# Altium PCB Control_Board.PcbDoc (part 1 of 4)
Units mm, origin at the board's own origin, x right, y up, seen from the top; angles counter-clockwise.
Board outline 90.17 x 96 mm, 6 copper layers (Top Layer, GND, POWER, Signal, PGND, Bottom Layer), stack 1.346 mm thick; 251 components, 196 nets, 963 pads, 633 vias.
Unrouted connection lines stored in the file: 3.
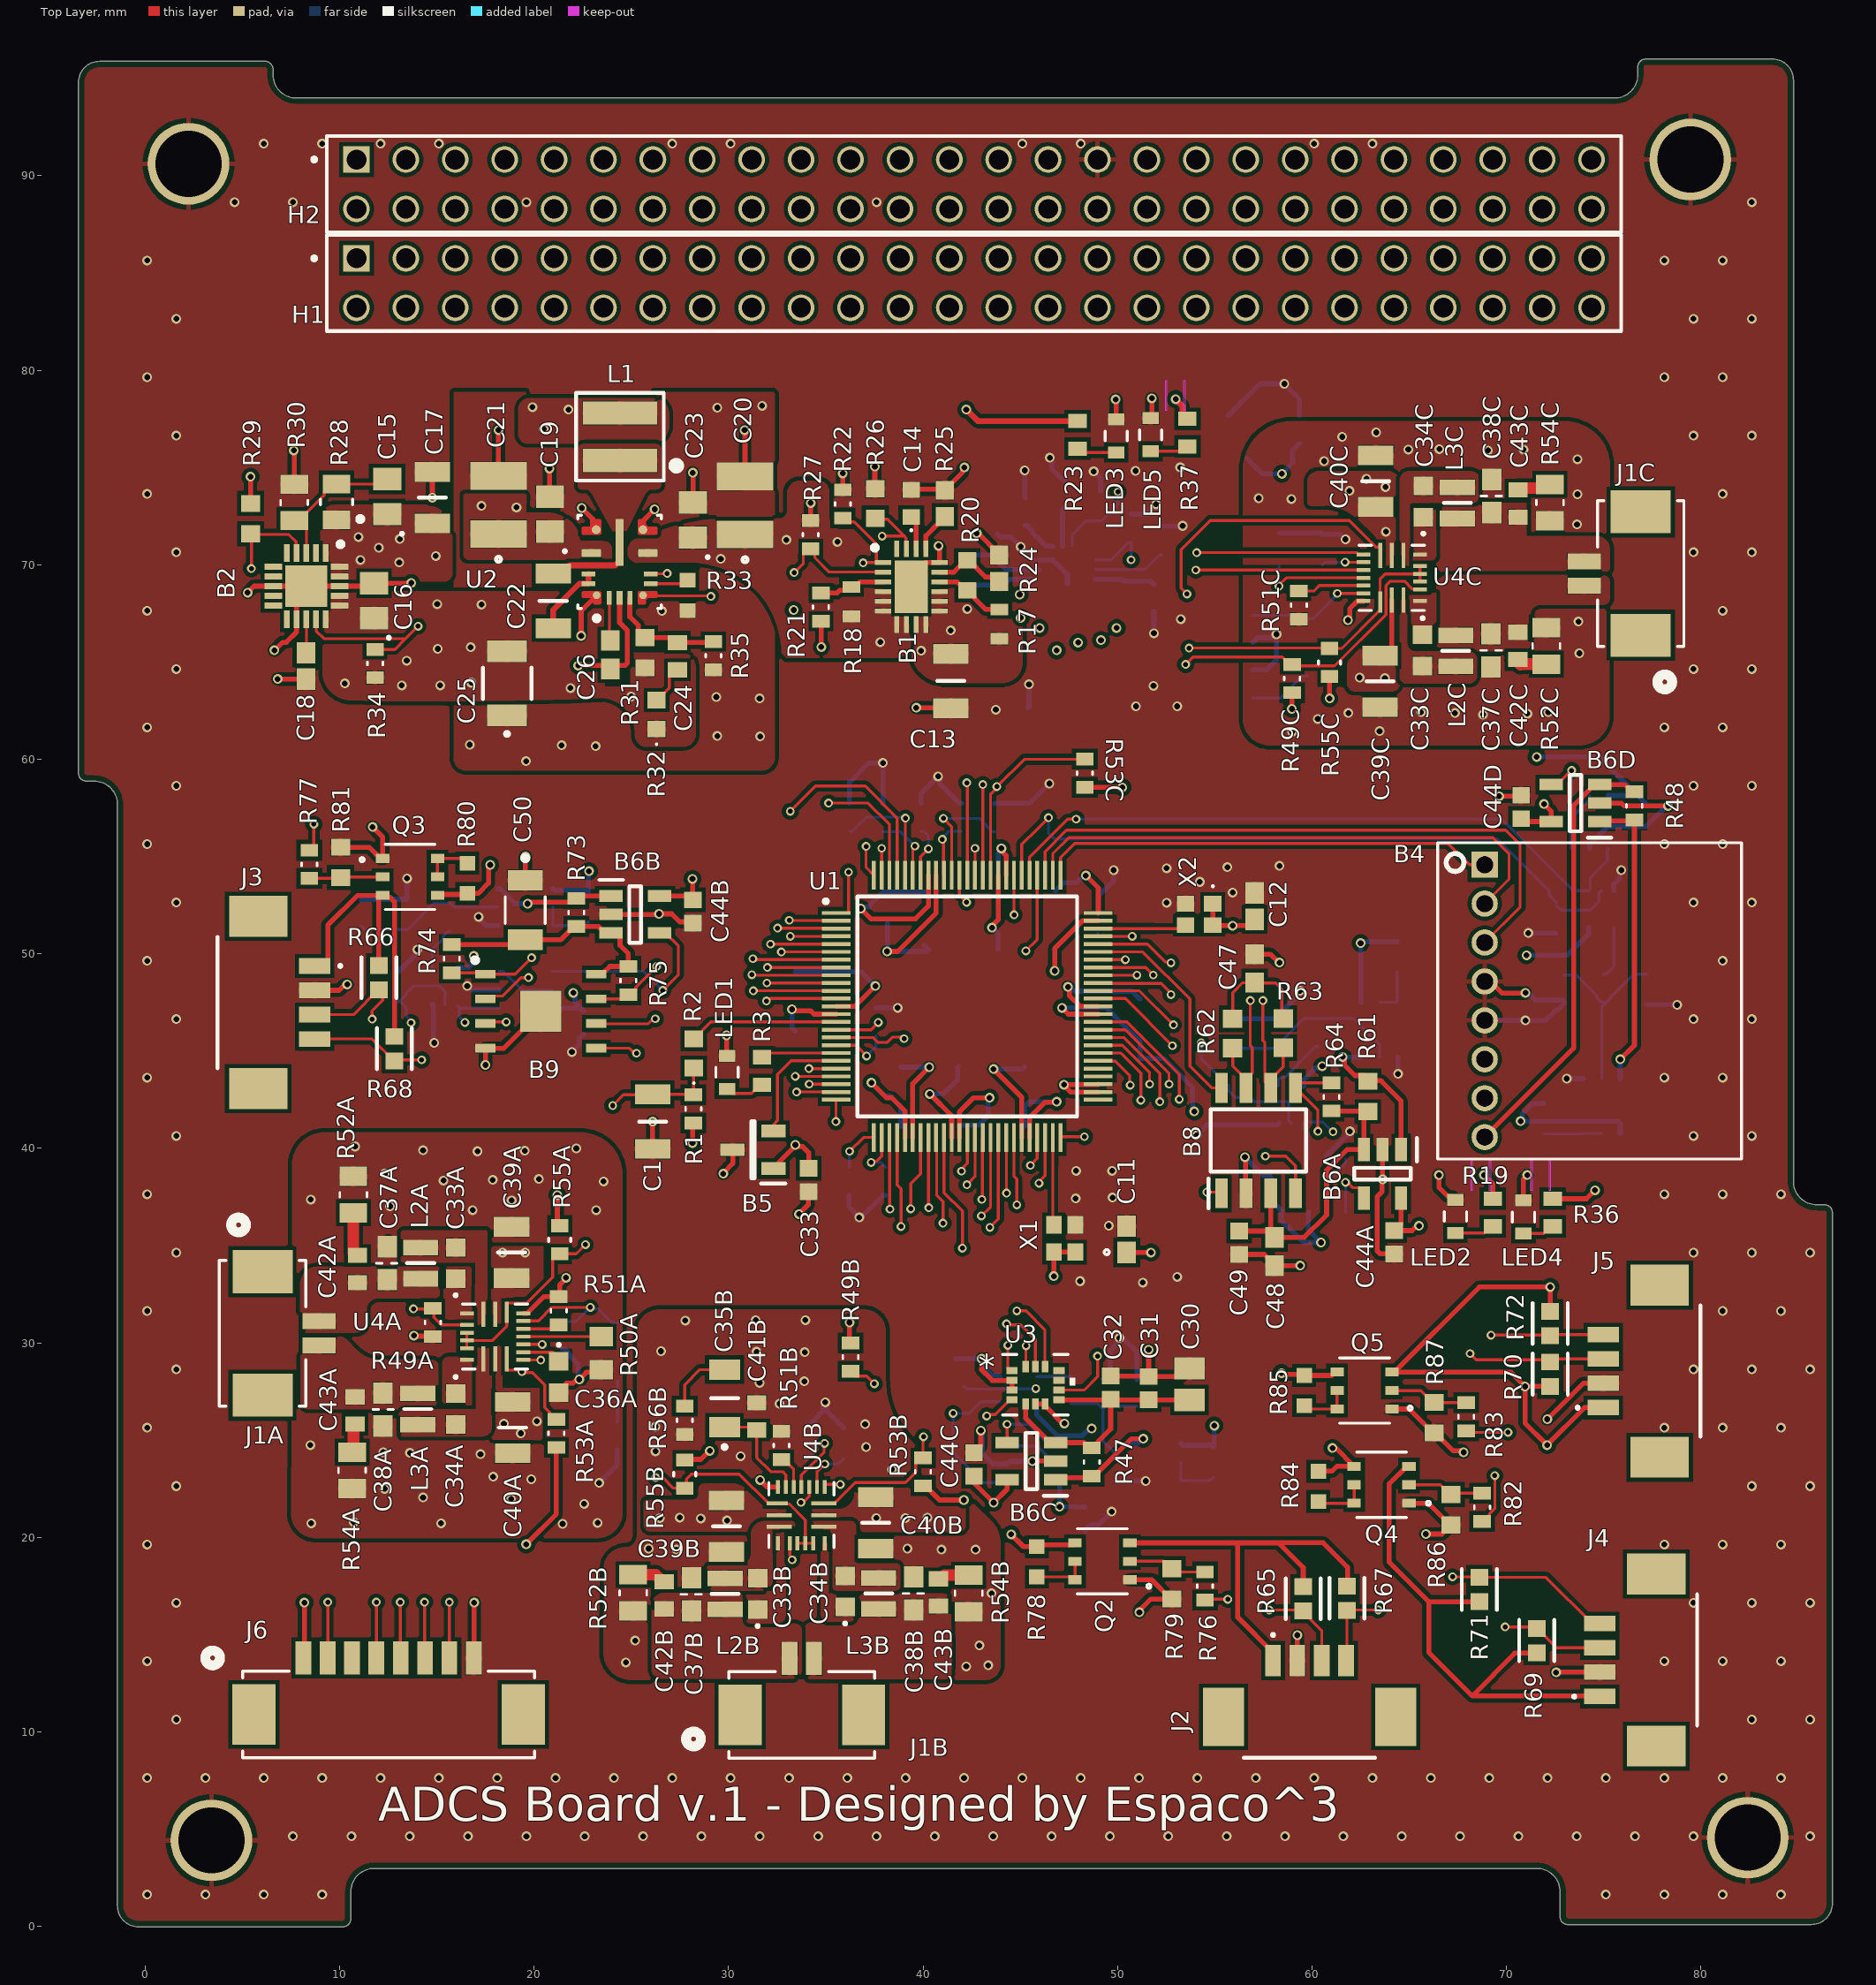
[diagram p0: Top Layer view]
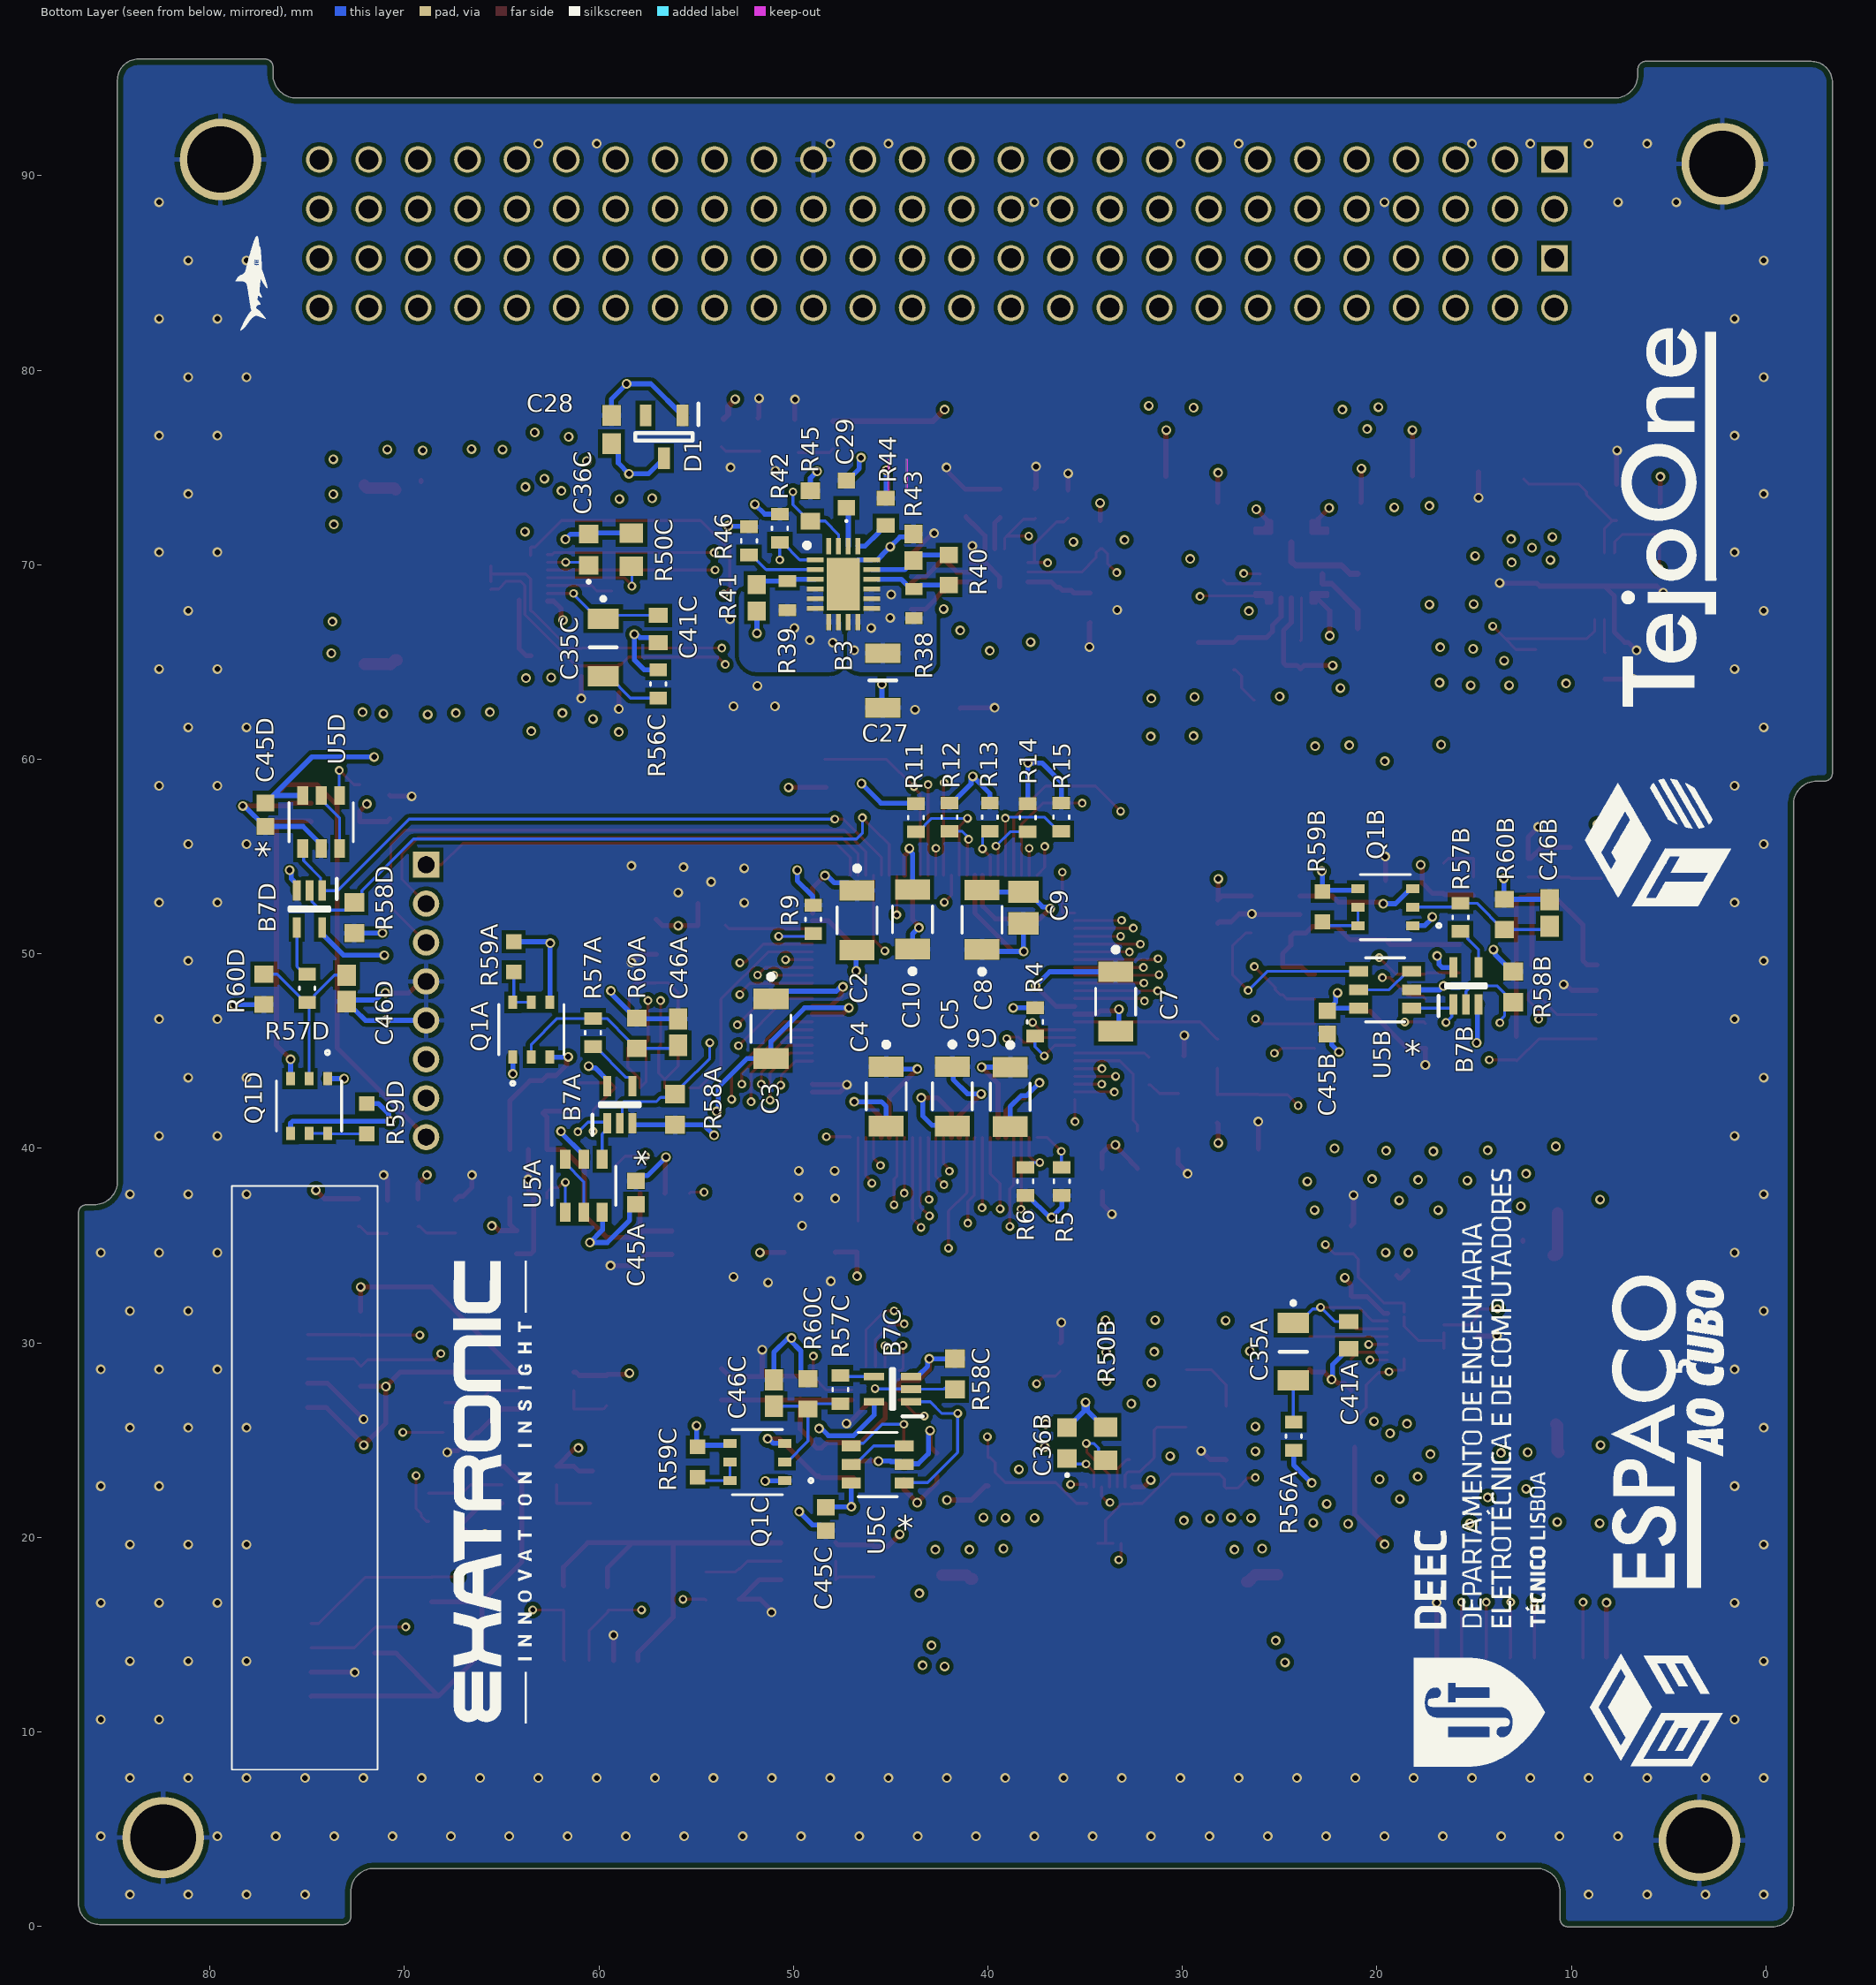
[diagram p1: Bottom Layer view, seen from below]
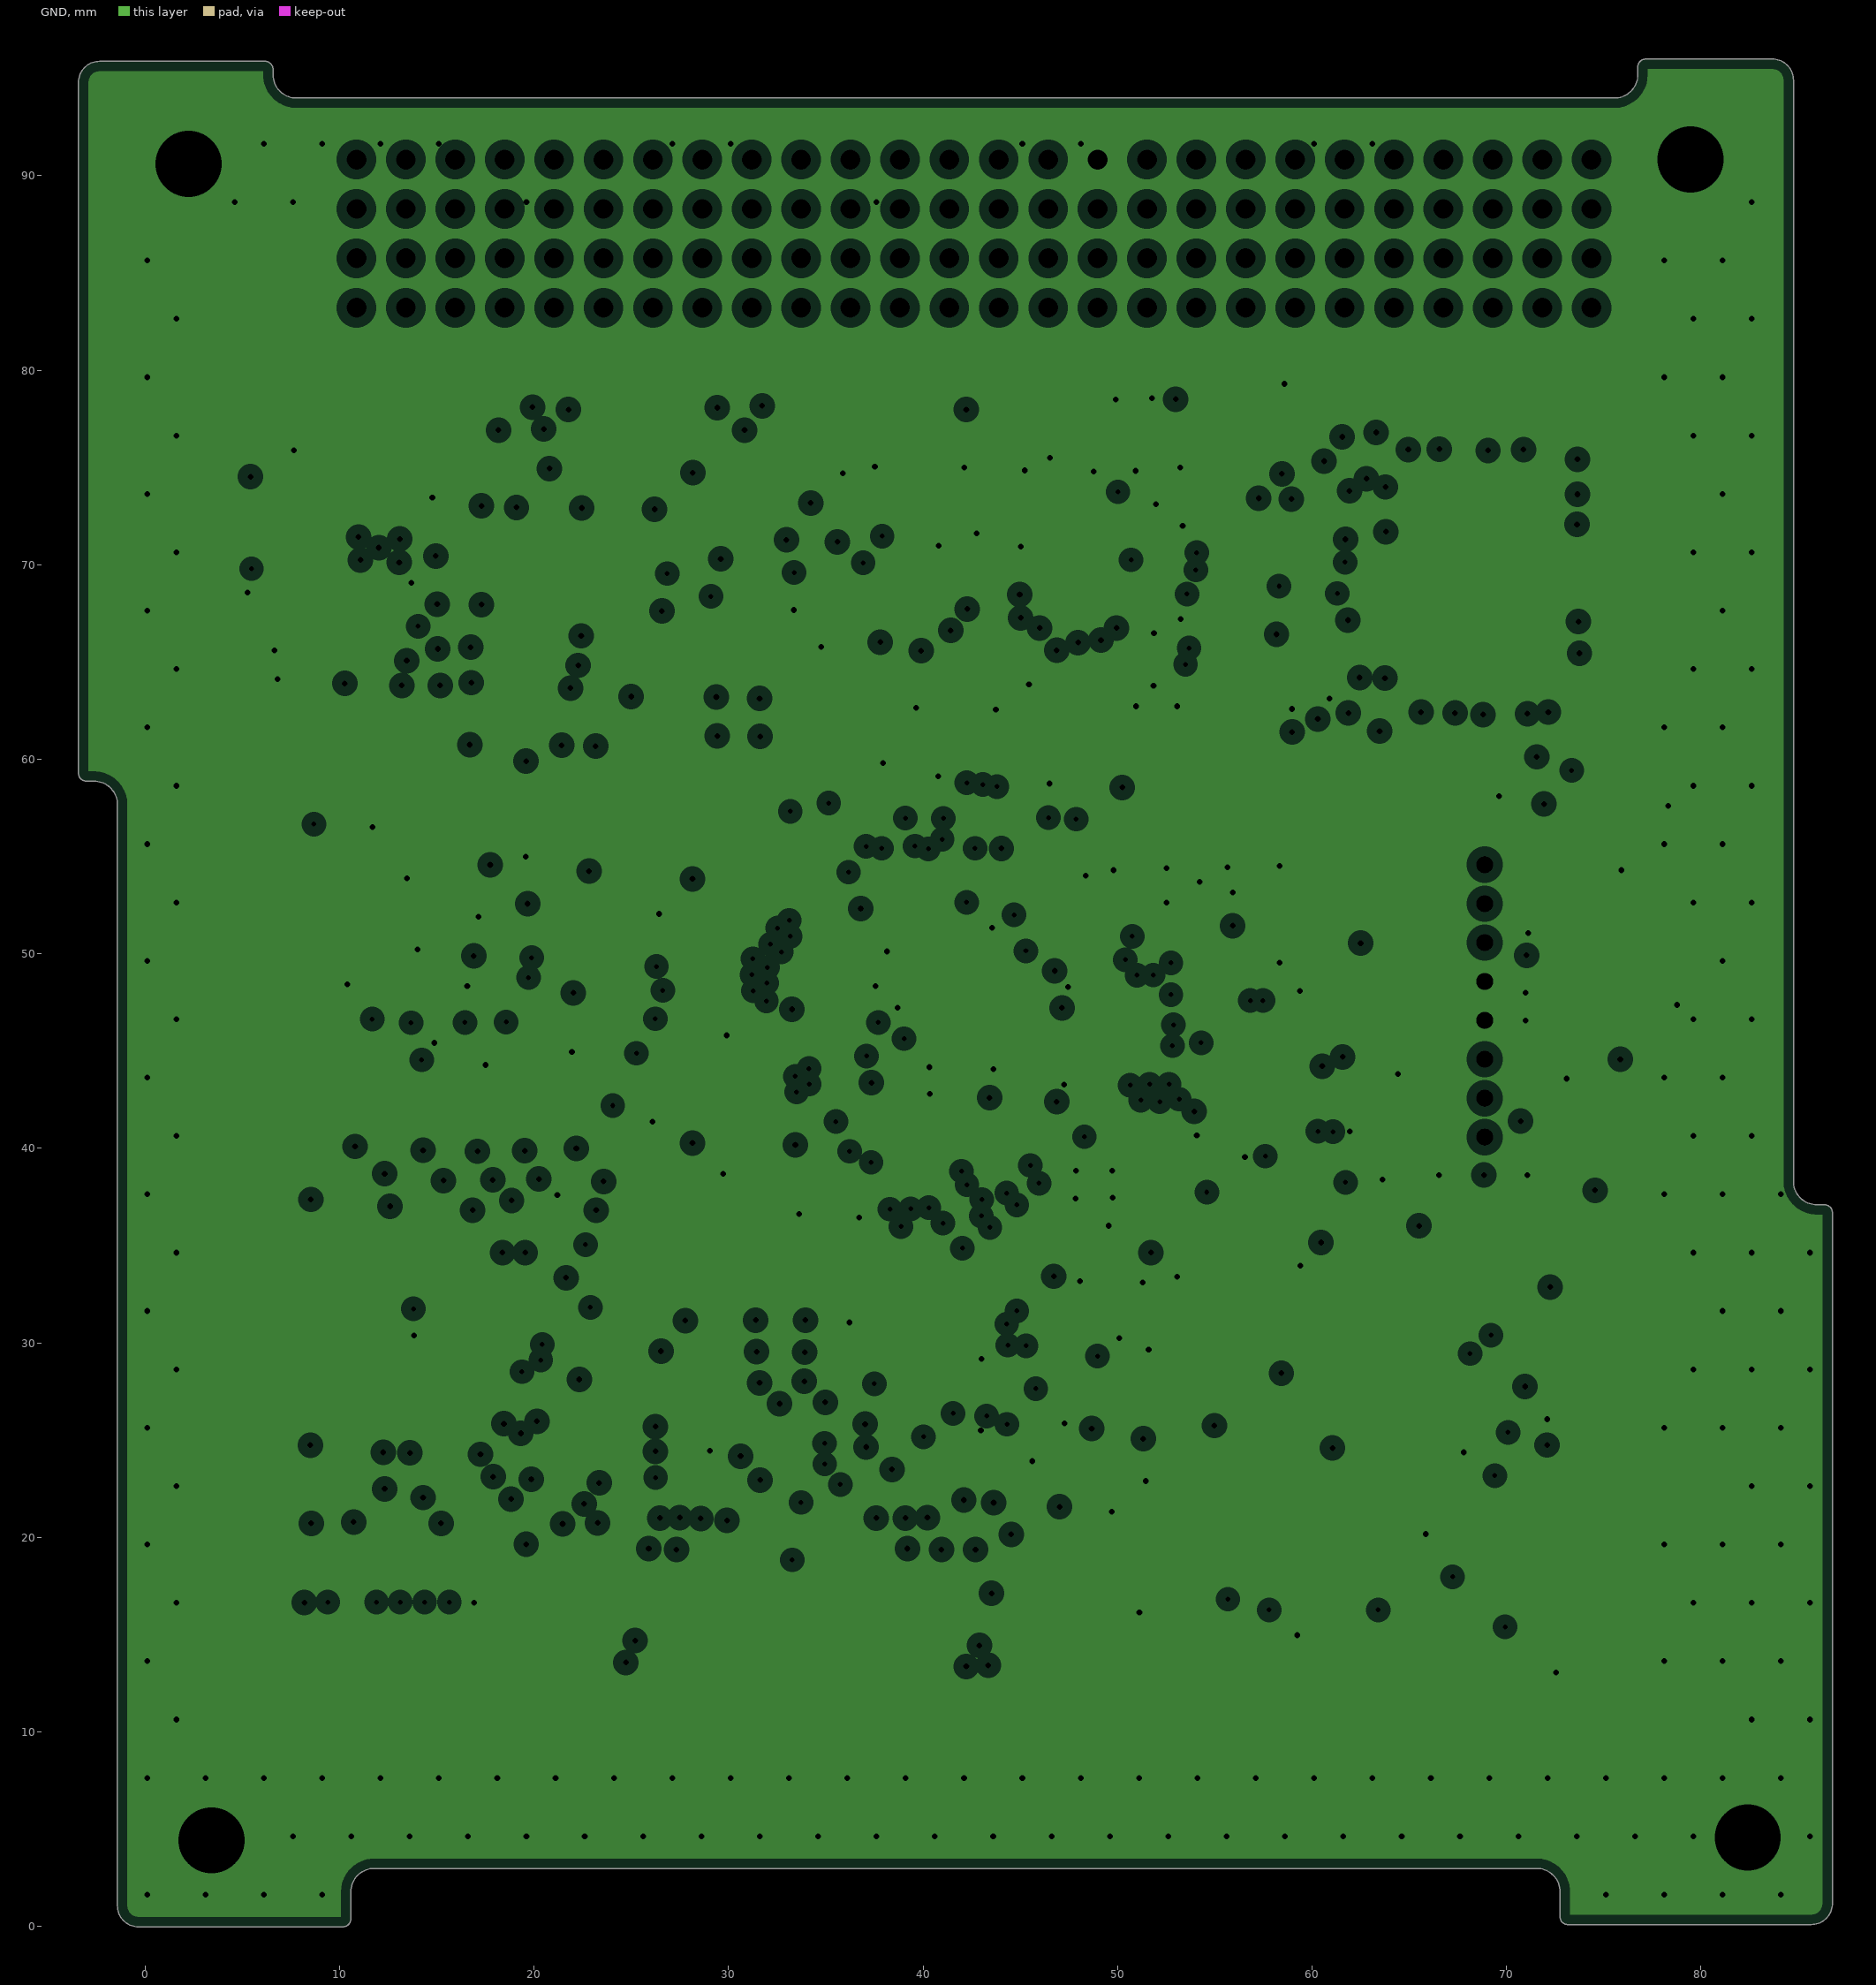
[diagram p2: GND, clearances drawn from the general rule]
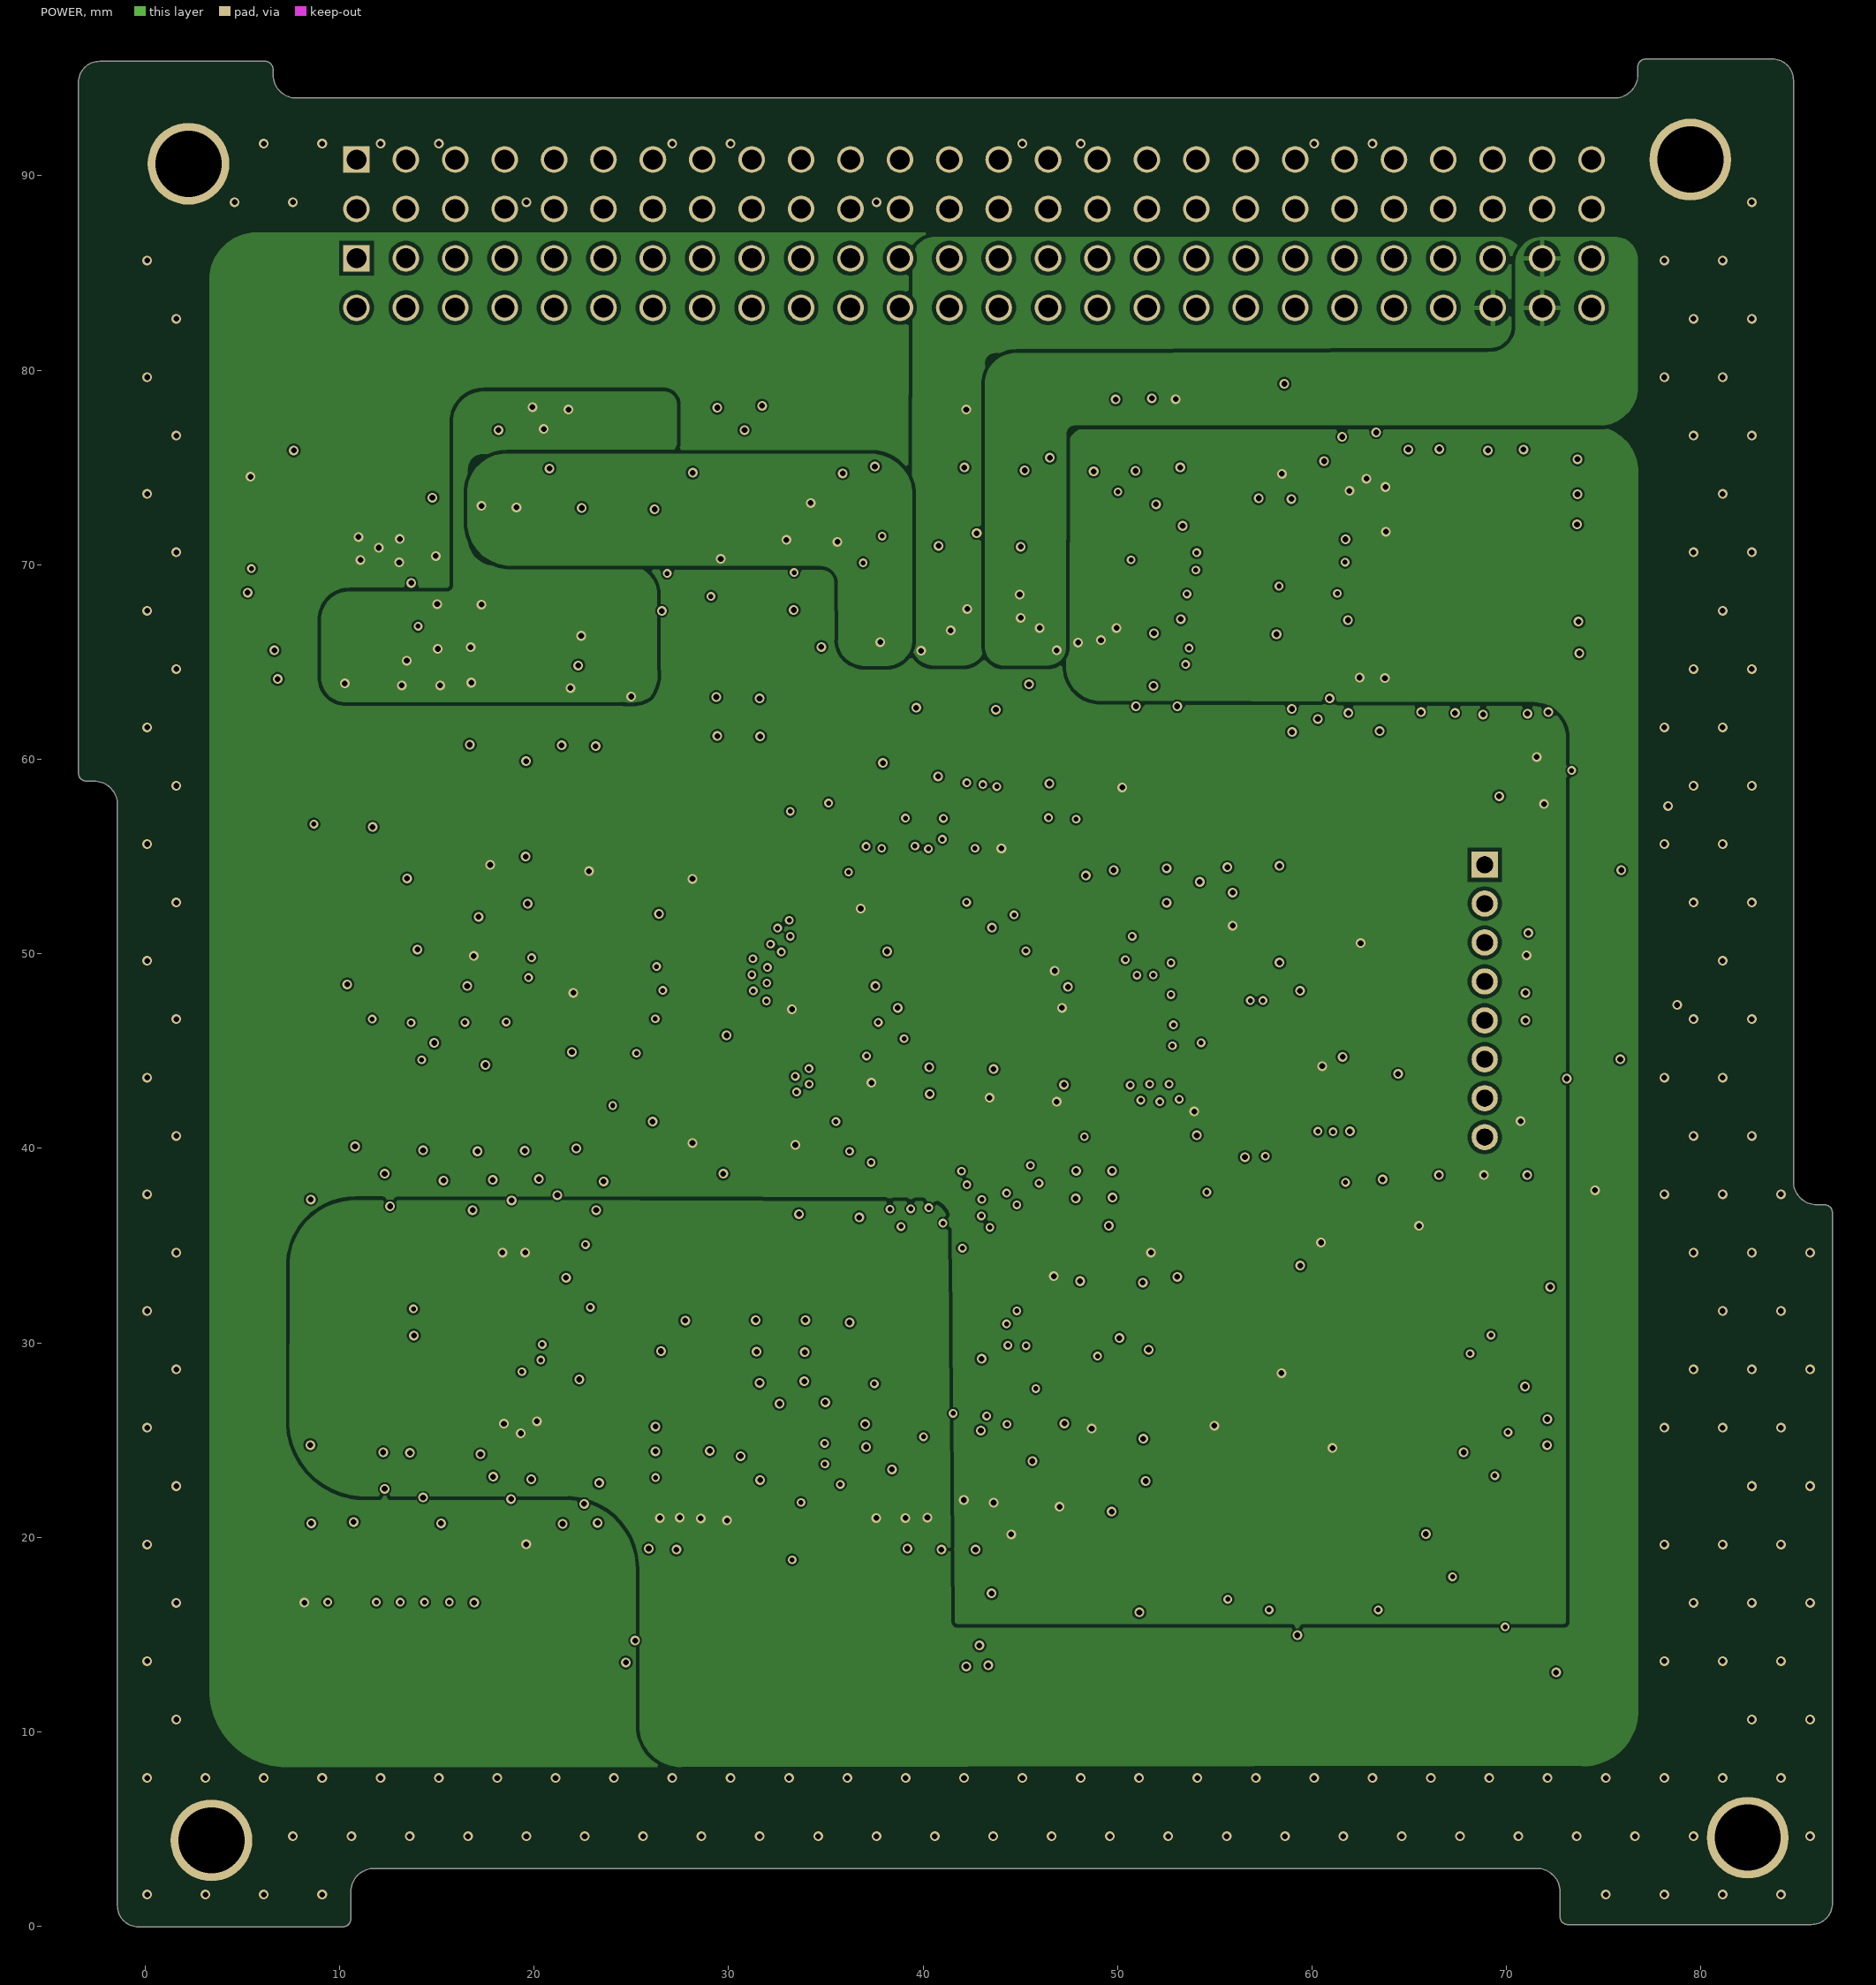
[diagram p3: POWER]
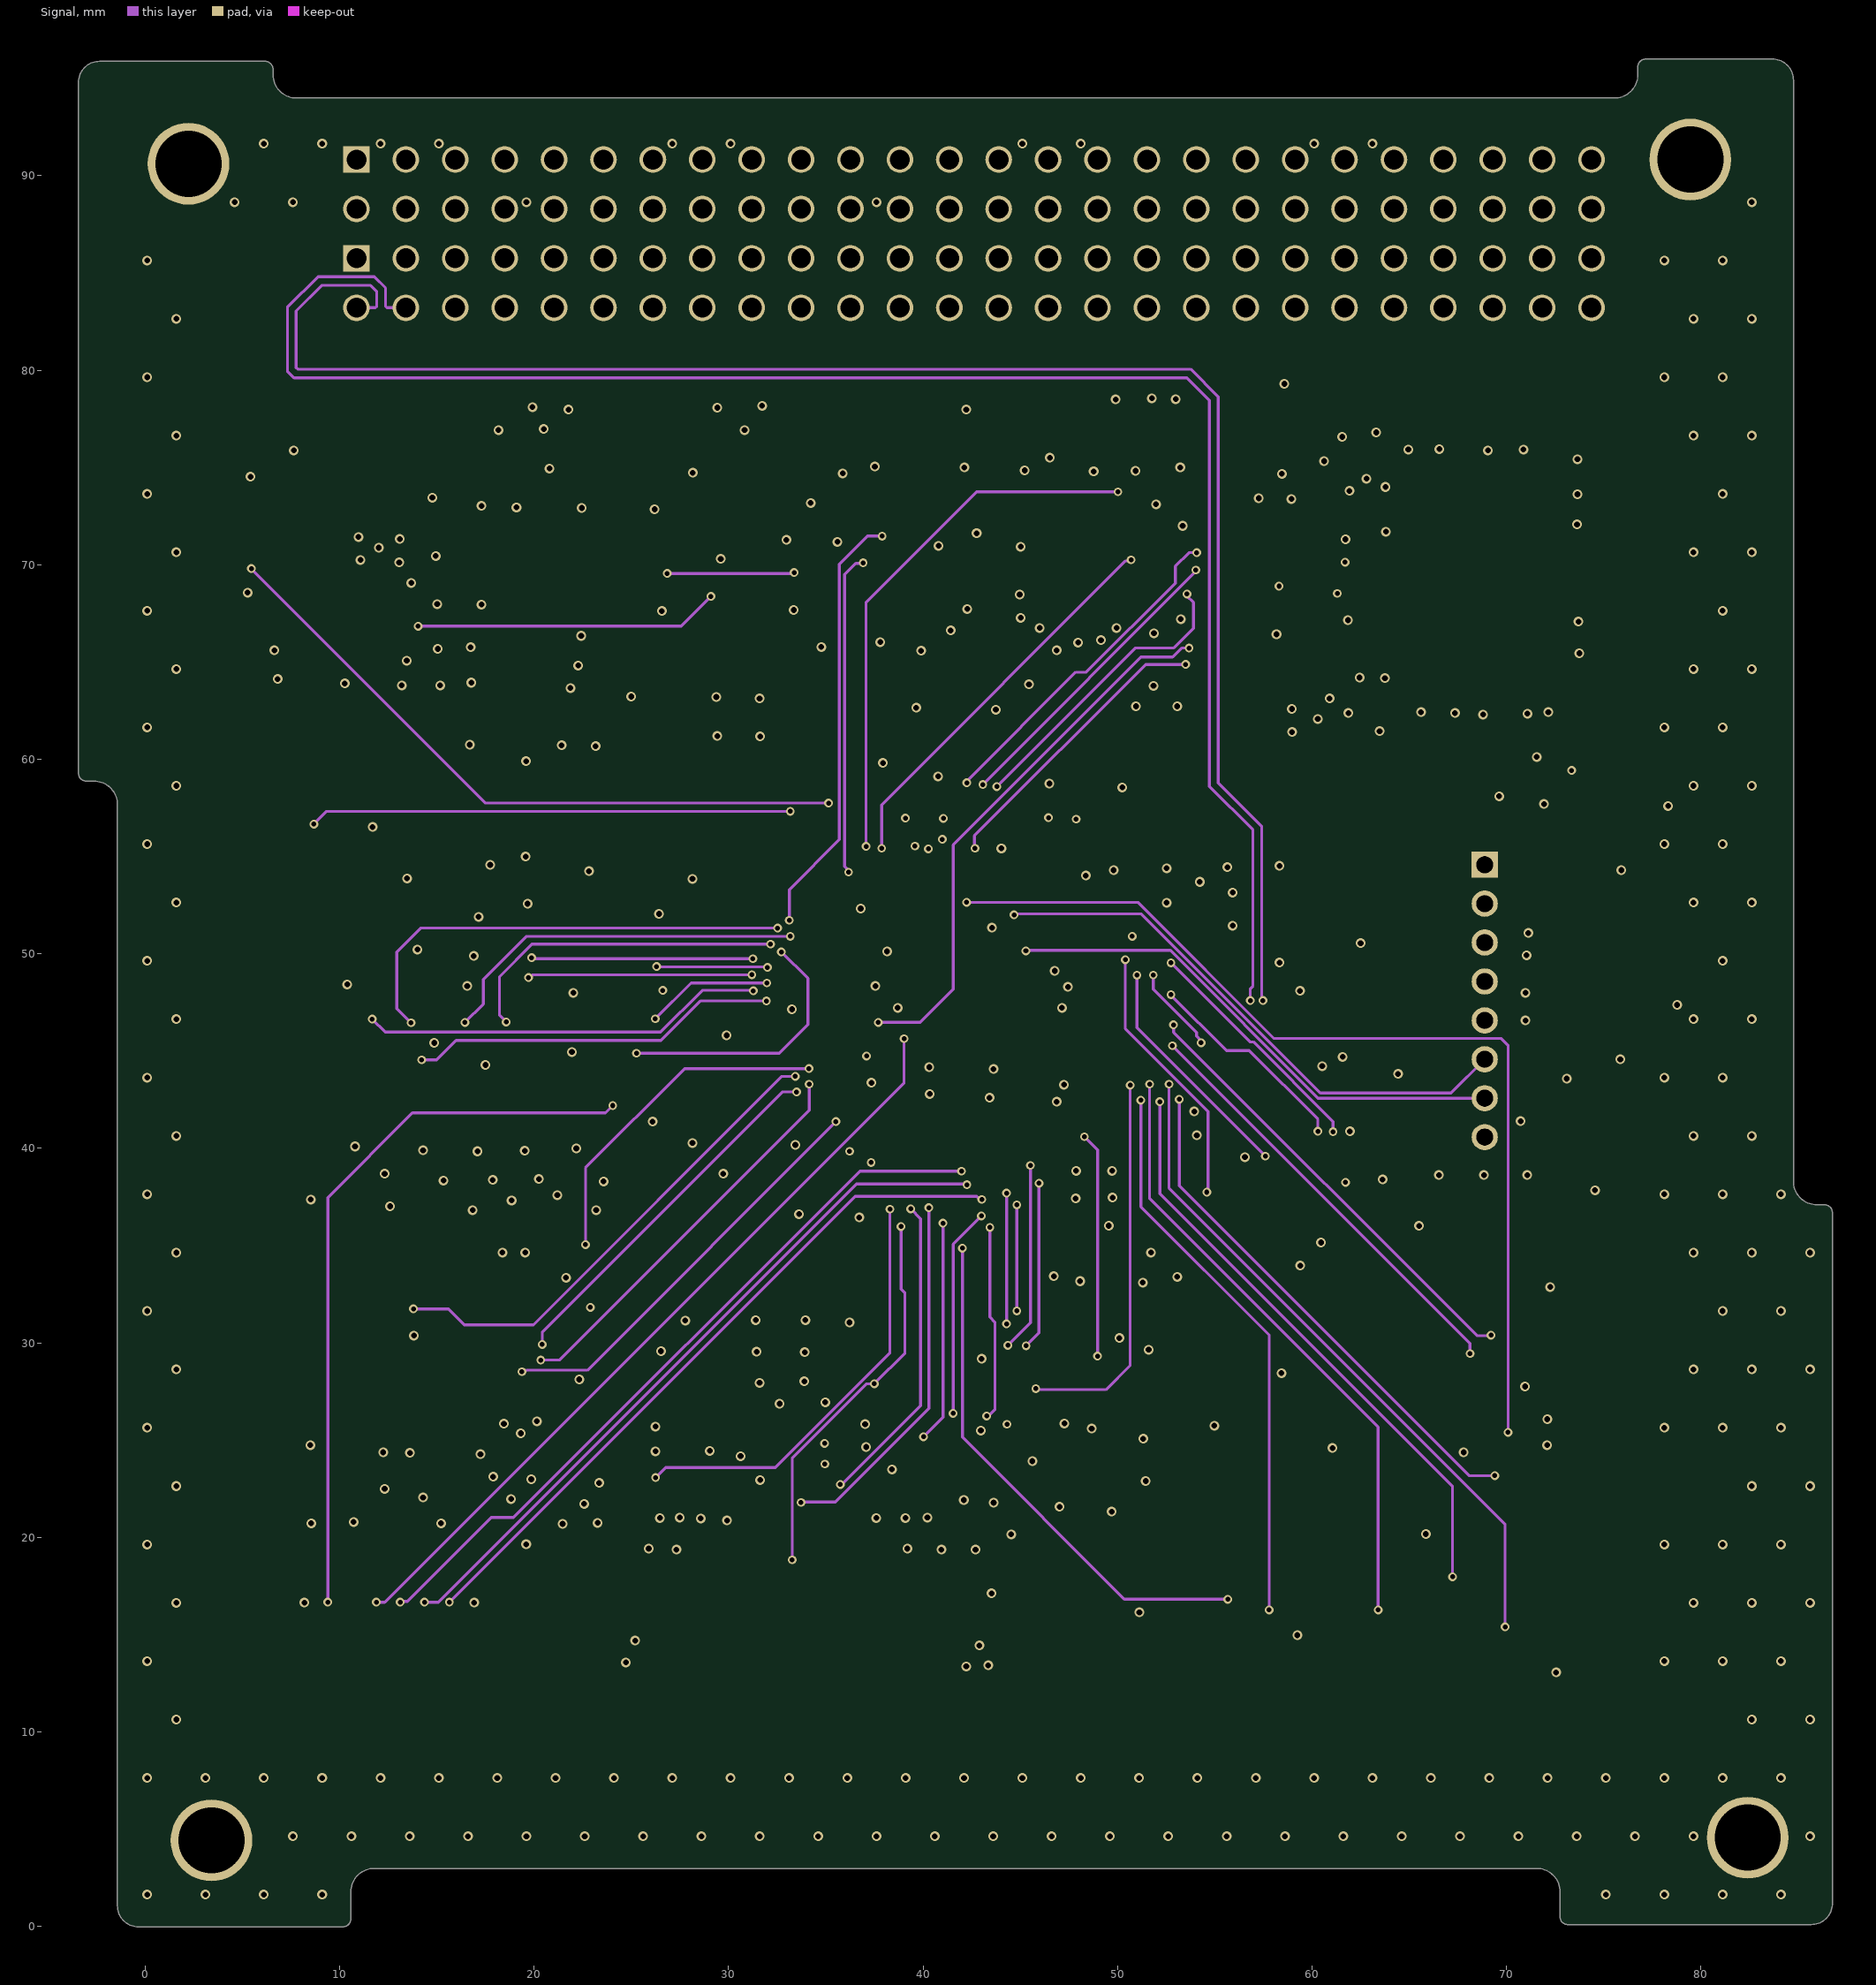
[diagram p4: Signal]
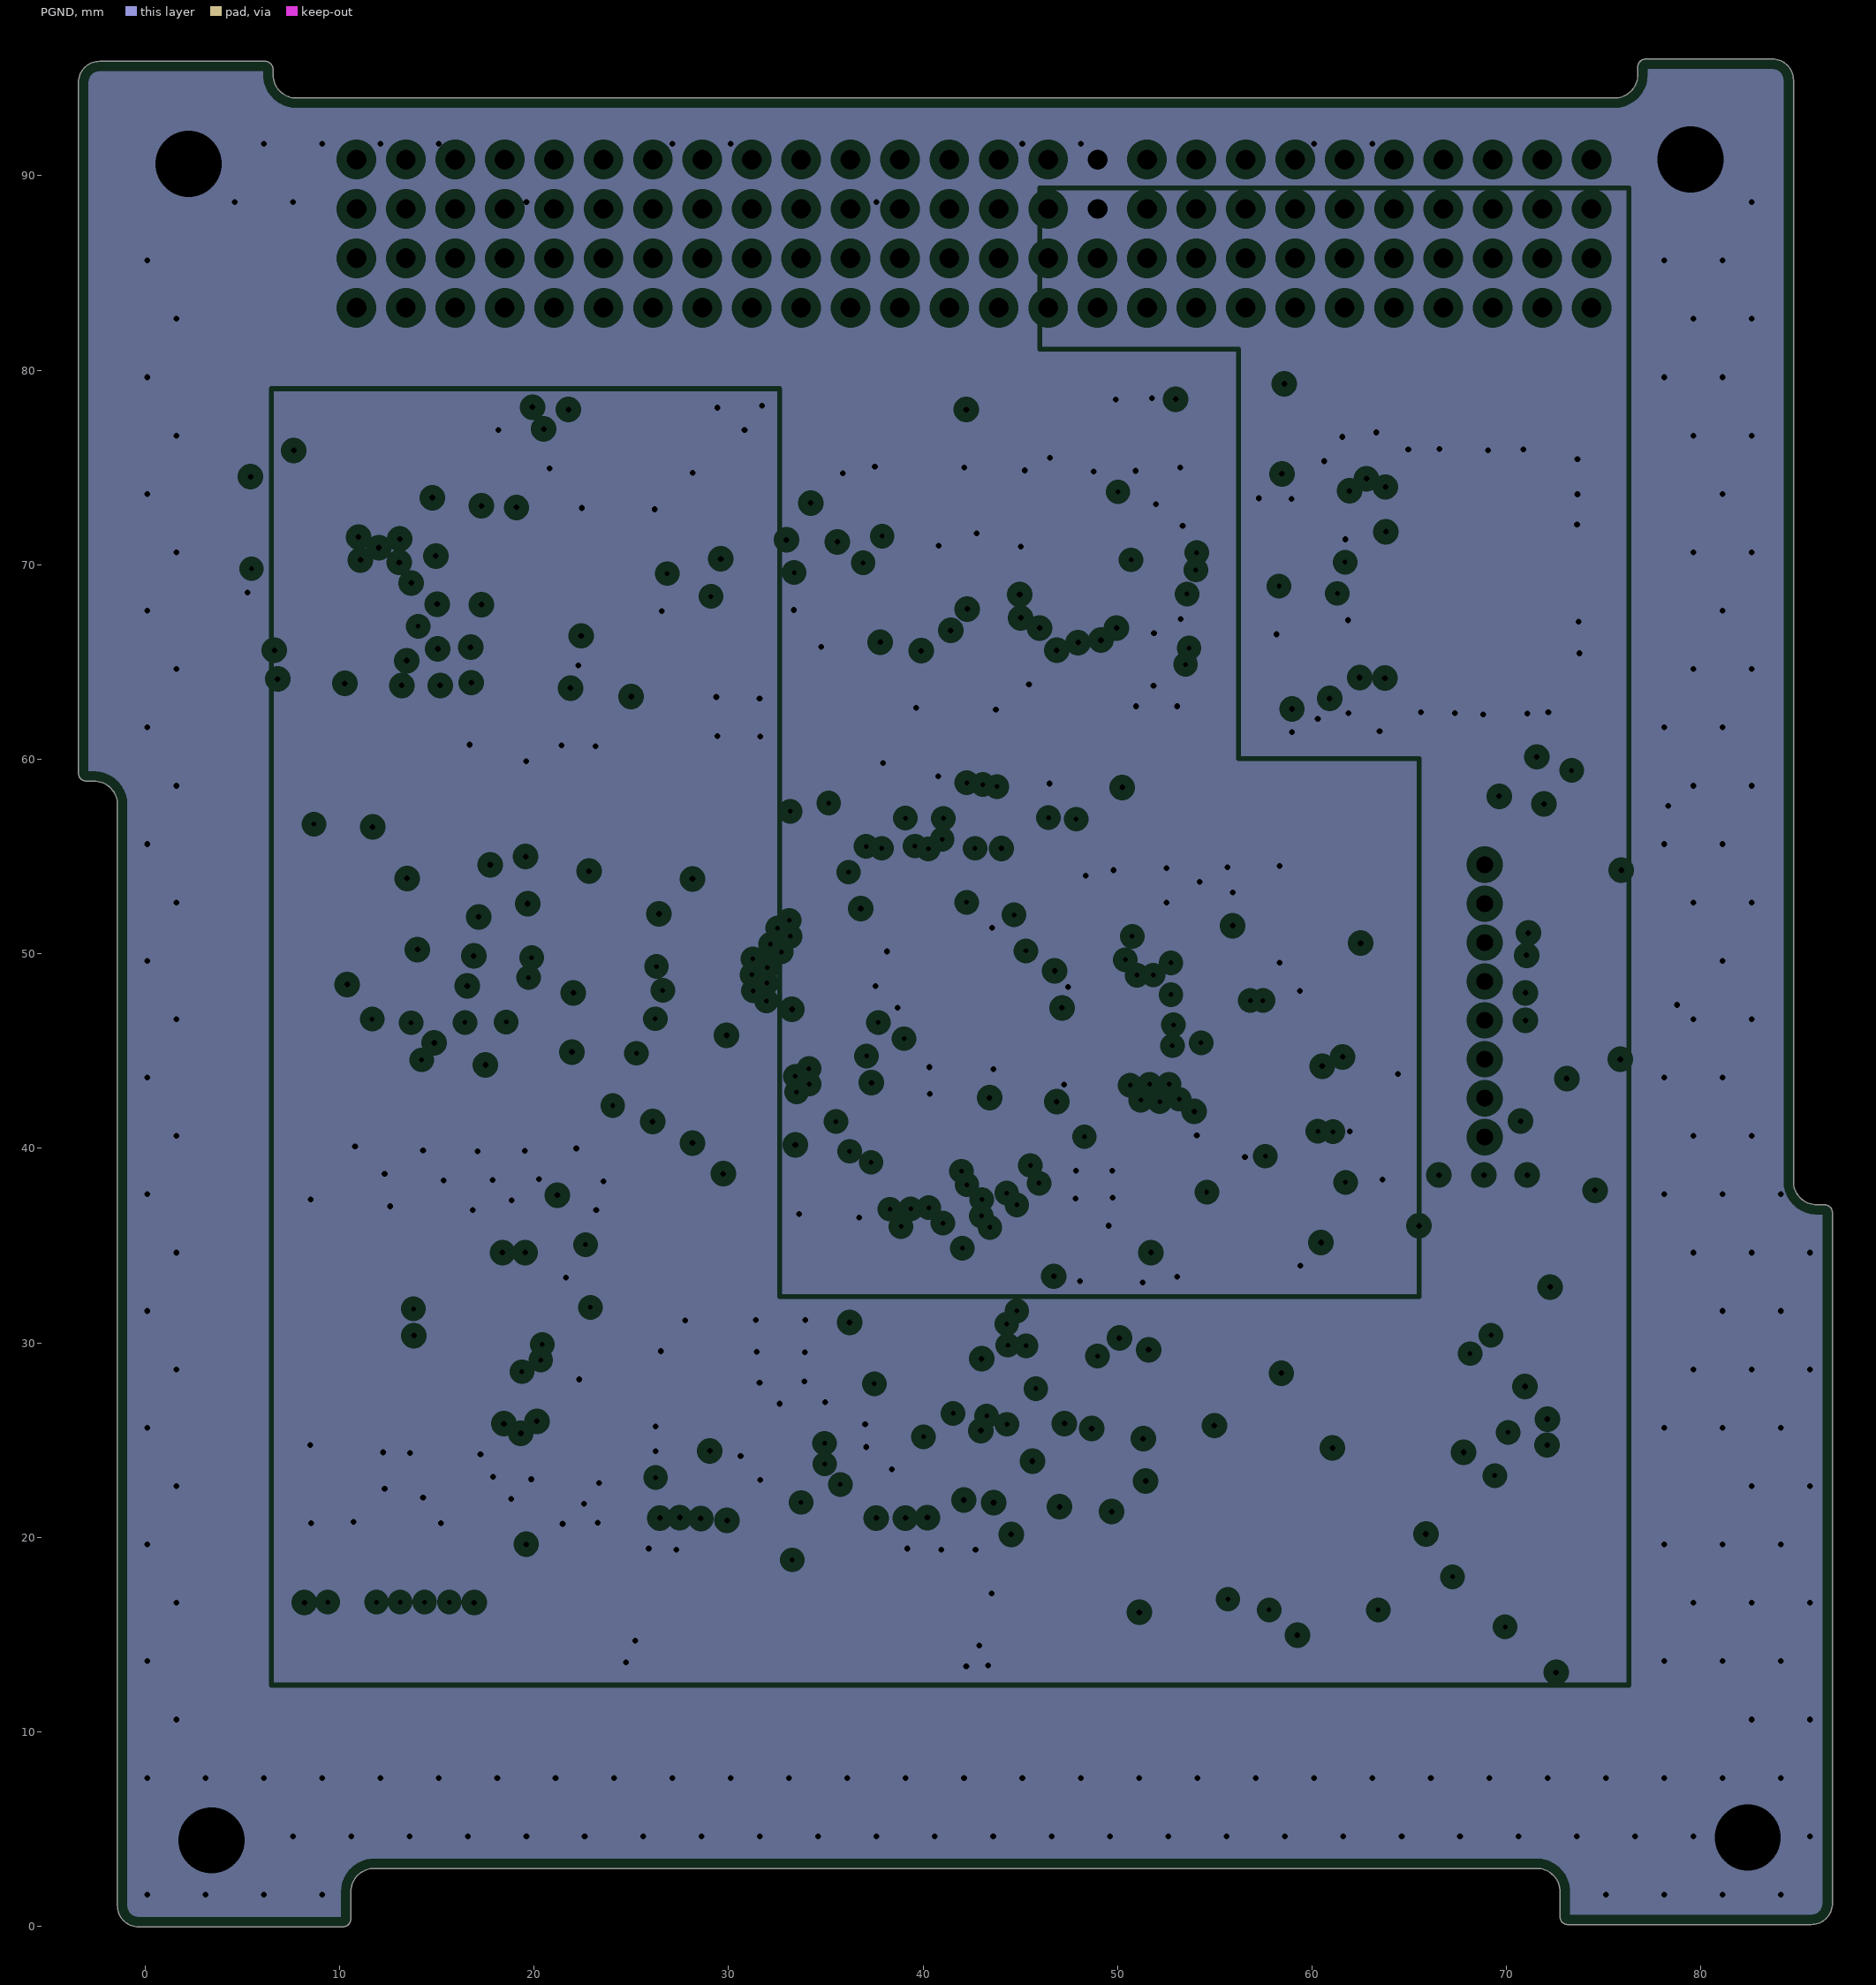
[diagram p5: PGND, clearances drawn from the general rule]
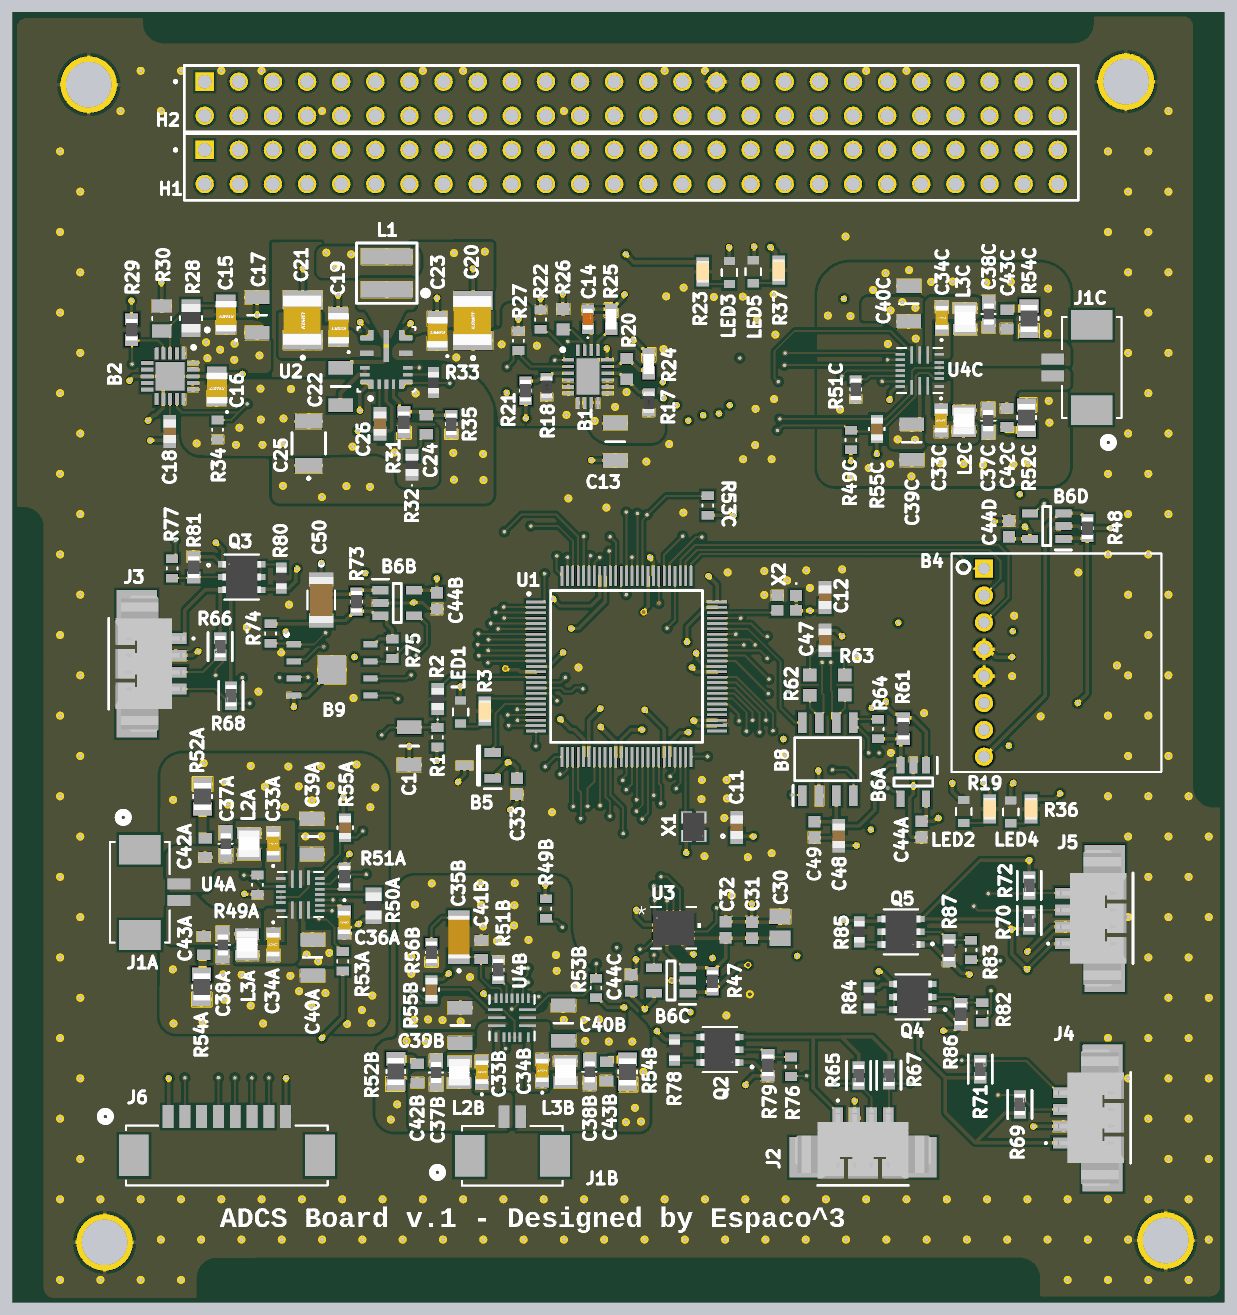
[diagram p8: 3D render of the assembled board from above, using the file's embedded part models]
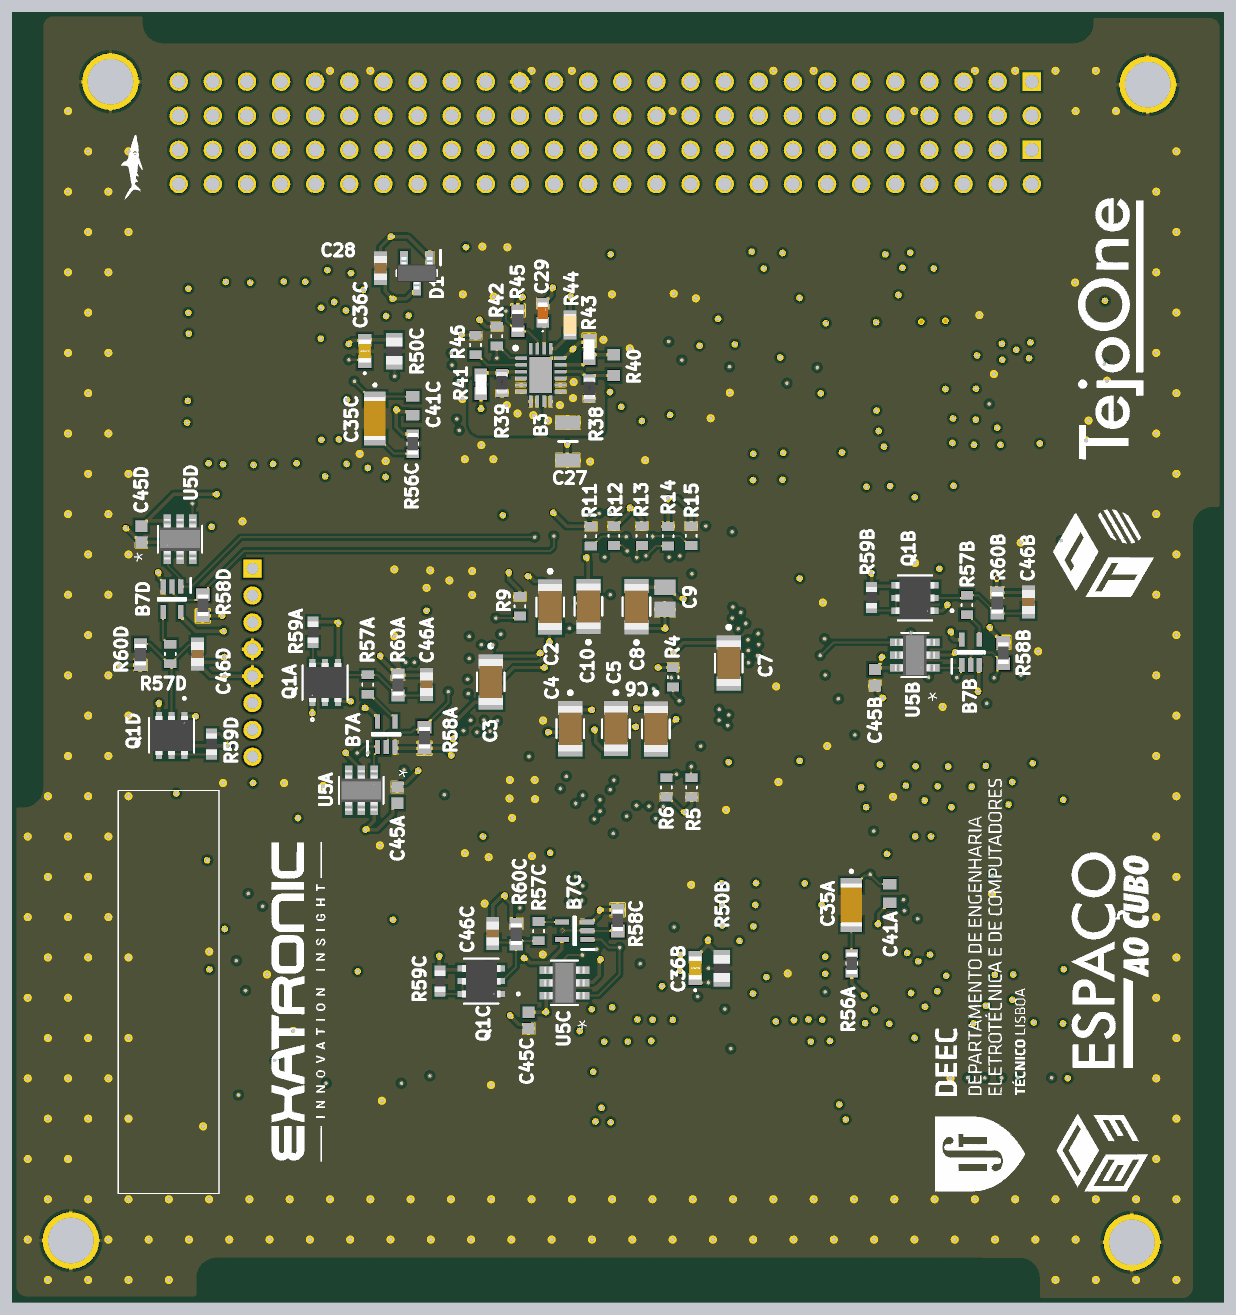
[diagram p9: 3D render of the assembled board from below, using the file's embedded part models]

## Layer stack, top to bottom
Top Solder: solder mask 0.0102, Solder Resist, Dk 3.5
Top Layer: signal copper 0.105
Dielectric 2: prepreg 0.164, FR408HR, Dk 3.68
GND: plane copper 0.14, net GND
Dielectric 4: core 0.086, FR408HR, Dk 3.68
POWER: signal copper 0.14
Dielectric 5: core 0.086, FR408HR, Dk 3.68
Signal: signal copper 0.14
Dielectric 3: core 0.076, FR408HR, Dk 3.68
PGND: plane copper 0.14, net (Multiple Nets)
Dielectric 1: prepreg 0.164, FR408HR, Dk 3.68
Bottom Layer: signal copper 0.105
Board Layer Stack Bottom Solder: solder mask 0.0102, Solder Resist, Dk 3.5

## Board outline
-1.416,1.069 -1.416,57.676 ccw(c-2.618,57.676) -2.618,58.877 -3.015,58.877 cw(c-3.015,59.279) -3.416,59.279 -3.416,94.794 cw(c-2.333,94.794) -2.333,95.877 6.182,95.877 cw(c6.177,95.471) 6.584,95.476 6.588,95.076 ccw(c7.784,95.194) 7.784,93.992 75.551,93.992 ccw(c75.551,95.194) 76.752,95.194 76.752,95.59 cw(c77.154,95.59) 77.154,95.992 83.671,95.992 cw(c83.671,94.91) 84.752,94.91 84.752,38.304 ccw(c85.954,38.304) 85.954,37.102 86.351,37.102 cw(c86.351,36.7) 86.752,36.7 86.752,1.185 cw(c85.669,1.185) 85.669,0.102 73.153,0.102 cw(c73.153,0.503) 72.752,0.503 72.752,1.902 ccw(c71.554,1.783) 71.554,2.987 11.667,2.982 ccw(c11.785,1.786) 10.584,1.786 10.584,0.389 cw(c10.182,0.389) 10.182,-0.013 -0.334,-0.013 cw(c-0.334,1.069)

## Design rules (kind name [scope] priority, off if disabled: settings)
BoardOutlineClearance [All] p1: gap=0.3 ignorepadtopadclearanceinfootprint=FALSE
Clearance [All] p1: gap=0.2 ignorepadtopadclearanceinfootprint=TRUE except(0.1: Arc-Arc Arc-Track Arc-SMDPad Arc-Via Track-Track Track-SMDPad Track-Via SMDPad-SMDPad Via-Via; 0.15: Arc-THPad Arc-Text Track-THPad Track-Text SMDPad-THPad SMDPad-Via SMDPad-Text THPad-THPad THPad-Via THPad-Text Via-Text Text-Text)
ComponentClearance [All] p1: gap=0.102 collisioncheckmode=3 verticalgap=0.102 showdistances=TRUE
DiffPairsRouting [All] p1: maxlimit=0.6 minlimit=0.3 mostfreqgap=0.5 toplayer_minwidth=0.13 toplayer_maxwidth=0.18 toplayer_prefwidth=0.15 midlayer1_prefgap=0.3 midlayer1_minwidth=0.13 midlayer1_maxwidth=0.18 midlayer1_prefwidth=0.15 midlayer2_prefgap=0.3 midlayer2_minwidth=0.13 midlayer2_maxwidth=0.18 midlayer2_prefwidth=0.15 bottomlayer_prefgap=0.3 bottomlayer_minwidth=0.13 bottomlayer_maxwidth=0.18 bottomlayer_prefwidth=0.15 maxuncoupledlength=12.7
Height [All] p1: minheight=0 maxheight=1816.048 prefheight=12.7
HoleSize [All] p1: absolutevalues=TRUE maxlimit=5.6 minlimit=0.25 maxpercent=80.000 minpercent=20.000
HoleToHoleClearance [All] p1: gap=0.3 allowstackedmicrovias=FALSE
MinimumAnnularRing [All] p1: minimumring=0.1
MinimumSolderMaskSliver [All] p1: minsoldermaskwidth=0.1
PlaneClearance PlaneClearanceMidLayer1 [OnLayer('GND')] p1: clearance=0.102
PlaneClearance PlaneClearanceMidLayer2 [OnLayer('PGND')] p2: clearance=0.102
PlaneClearance PlaneClearanceTopLayer [OnLayer('Top Layer')] p3: clearance=0.203
PlaneClearance PlaneClearanceBottomLayer [OnLayer('Bottom Layer')] p4: clearance=0.203
PlaneConnect [All] p1: planeconnectstyle=Direct reliefexpansion=0.508 reliefentries=4 reliefconductorwidth=0.254 reliefairgap=0.254
PlaneConnect PlaneConnectPowerPads [InPadClass('PowerPads')] p2: planeconnectstyle=Direct reliefexpansion=0.508 reliefentries=4 reliefconductorwidth=0.254 reliefairgap=0.254
PlaneConnect PlaneConnectTopLayer [OnLayer('Top Layer')] p3: planeconnectstyle=Direct reliefexpansion=0.3 reliefentries=4 reliefconductorwidth=0.203 reliefairgap=0.203
PlaneConnect PlaneConnectBottomLayer [OnLayer('Bottom Layer')] p4: planeconnectstyle=Direct reliefexpansion=0.3 reliefentries=4 reliefconductorwidth=0.203 reliefairgap=0.203
PlaneConnect PlaneConnectMidLayer1 [OnLayer('Mid Layer 1')] p5: planeconnectstyle=Direct reliefexpansion=0.3 reliefentries=4 reliefconductorwidth=0.102 reliefairgap=0.102
PlaneConnect PlaneConnectMidLayer2 [OnLayer('Mid Layer 2')] p6: planeconnectstyle=Direct reliefexpansion=0.3 reliefentries=4 reliefconductorwidth=0.102 reliefairgap=0.102
PolygonConnect [All] p1: thpad.connectstyle=Relief thpad.reliefconductorwidth=0.254 thpad.reliefentries=4 thpad.polygonreliefangle="90 Angle" thpad.airgapwidth=0.254 smdpad.connectstyle=Relief smdpad.reliefconductorwidth=0.254 smdpad.reliefentries=4 smdpad.polygonreliefangle="90 Angle" smdpad.airgapwidth=0.02 via.connectstyle=Direct via.reliefconductorwidth=0.254 via.reliefentries=4 via.polygonreliefangle="90 Angle" via.airgapwidth=0.254
PolygonConnect PolygonConnectOscillator [All vs (InComponent('X1') OR InComponent('X2'))] p2 off: connectstyle=Relief reliefconductorwidth=0.254 reliefentries=4 polygonreliefangle="90 Angle" airgapwidth=0.254
PolygonConnect PolygonConnectPowerPads [All vs (InPadClass('PowerPads'))] p3 off: thpad.connectstyle=Relief thpad.reliefconductorwidth=0.254 thpad.reliefentries=4 thpad.polygonreliefangle="90 Angle" thpad.airgapwidth=0.254 smdpad.connectstyle=Direct smdpad.reliefconductorwidth=0.254 smdpad.reliefentries=4 smdpad.polygonreliefangle="90 Angle" smdpad.airgapwidth=0.254 via.connectstyle=Direct via.reliefconductorwidth=0.254 via.reliefentries=4 via.polygonreliefangle="90 Angle" via.airgapwidth=0.254
PolygonConnect PolygonConnectMidLayer1 [OnLayer('Mid Layer 1') vs OnLayer('Mid Layer 1')] p4 off: thpad.connectstyle=Relief thpad.reliefconductorwidth=0.102 thpad.reliefentries=4 thpad.polygonreliefangle="90 Angle" thpad.airgapwidth=0.102 smdpad.connectstyle=Relief smdpad.reliefconductorwidth=0.102 smdpad.reliefentries=4 smdpad.polygonreliefangle="90 Angle" smdpad.airgapwidth=0.102 via.connectstyle=Direct via.reliefconductorwidth=0.102 via.reliefentries=4 via.polygonreliefangle="90 Angle" via.airgapwidth=0.102
PolygonConnect PolygonConnectMidLayer2 [OnLayer('Mid Layer 2') vs OnLayer('Mid Layer 2')] p5 off: thpad.connectstyle=Relief thpad.reliefconductorwidth=0.102 thpad.reliefentries=4 thpad.polygonreliefangle="90 Angle" thpad.airgapwidth=0.102 smdpad.connectstyle=Relief smdpad.reliefconductorwidth=0.102 smdpad.reliefentries=4 smdpad.polygonreliefangle="90 Angle" smdpad.airgapwidth=0.102 via.connectstyle=Direct via.reliefconductorwidth=0.102 via.reliefentries=4 via.polygonreliefangle="90 Angle" via.airgapwidth=0.102
PolygonConnect PolygonConnectTopLayer [OnLayer('Top Layer') vs OnLayer('Top Layer')] p6 off: thpad.connectstyle=Relief thpad.reliefconductorwidth=0.203 thpad.reliefentries=4 thpad.polygonreliefangle="90 Angle" thpad.airgapwidth=0.203 smdpad.connectstyle=Relief smdpad.reliefconductorwidth=0.203 smdpad.reliefentries=4 smdpad.polygonreliefangle="90 Angle" smdpad.airgapwidth=0.05 via.connectstyle=Direct via.reliefconductorwidth=0.203 via.reliefentries=4 via.polygonreliefangle="90 Angle" via.airgapwidth=0.203
PolygonConnect PolygonConnectBottomLayer [OnLayer('Bottom Layer') vs OnLayer('Bottom Layer')] p7 off: thpad.connectstyle=Relief thpad.reliefconductorwidth=0.203 thpad.reliefentries=4 thpad.polygonreliefangle="90 Angle" thpad.airgapwidth=0.203 smdpad.connectstyle=Relief smdpad.reliefconductorwidth=0.203 smdpad.reliefentries=4 smdpad.polygonreliefangle="90 Angle" smdpad.airgapwidth=0.203 via.connectstyle=Direct via.reliefconductorwidth=0.203 via.reliefentries=4 via.polygonreliefangle="90 Angle" via.airgapwidth=0.203
RoutingVias Power1 [InNetClass('SupplyMax')] p1: holewidth=0.35 width=0.65 viastyle="Through Hole" minholewidth=0.25 minwidth=0.45 maxholewidth=0.45 maxwidth=0.65
RoutingVias Power2 [InNetClass('SupplyMin')] p2: holewidth=0.35 width=0.65 viastyle="Through Hole" minholewidth=0.3 minwidth=0.45 maxholewidth=0.4 maxwidth=0.65
RoutingVias RoutingVias_1 [All] p3: holewidth=0.3 width=0.55 viastyle="Through Hole" minholewidth=0.25 minwidth=0.45 maxholewidth=0.45 maxwidth=0.65
SilkToSilkClearance [All] p1: silktosilkclearance=0.127
SilkToSolderMaskClearance [IsPad] p1: minsilkscreentomaskgap=0.125 clearancetoexposedcopper=FALSE
SolderMaskExpansion SolderMaskExpansion_Error [InComponent('B3') OR InComponent('U3')] p1: expansion=0.02 istentingtop=FALSE
SolderMaskExpansion SolderMaskExpansion_B2 [InComponent('B2')] p2: expansion=0.025 istentingtop=FALSE
SolderMaskExpansion SolderMaskExpansion_B1 [InComponent('B1')] p3: expansion=0.025 istentingtop=FALSE
SolderMaskExpansion [All] p4: expansion=0.05 istentingtop=FALSE
SupplyNets "Schematic Supply Nets_15" [InNet('3V3-YM')] p1: voltage=0.000
SupplyNets "Schematic Supply Nets_14" [InNet('3V3-ZP')] p2: voltage=0.000
SupplyNets "Schematic Supply Nets_13" [InNet('3V3-YP')] p3: voltage=0.000
SupplyNets "Schematic Supply Nets_4" [InNet('3V3-XM')] p4: voltage=0.000
SupplyNets "Schematic Supply Nets_3" [InNet('PGND')] p5: voltage=0.000
SupplyNets "Schematic Supply Nets_2" [InNet('5V')] p6: voltage=0.000
SupplyNets "Schematic Supply Nets_12" [InNet('VDD')] p7: voltage=0.000
SupplyNets "Schematic Supply Nets_1" [InNet('GND')] p8: voltage=0.000
SupplyNets "Schematic Supply Nets_10" [InNet('5V-MGTQ')] p9: voltage=0.000
SupplyNets "Schematic Supply Nets_9" [InNet('VConv')] p10: voltage=0.000
SupplyNets "Schematic Supply Nets_8" [InNet('3V3-MRAM')] p11: voltage=0.000
SupplyNets "Schematic Supply Nets_7" [InNet('3V3-CAN')] p12: voltage=0.000
SupplyNets "Schematic Supply Nets_6" [InNet('5V-ADCS')] p13: voltage=0.000
SupplyNets "Schematic Supply Nets_5" [InNet('VSwitch')] p14: voltage=0.000
SupplyNets "Schematic Supply Nets_11" [InNet('3V3-MGN')] p15: voltage=0.000
SupplyNets "Schematic Supply Nets" [InNet('3V3-IMU')] p16: voltage=0.000
UnRoutedNet [All] p1: checkbadconnections=TRUE
ViasUnderSMD [All] p1: allowed=FALSE
Width Magnetorquer [InNetClass('Magnetorquer')] p1: maxlimit=0.62 minlimit=0.58 preferedwidth=0.6
Width Power_12mil [InNetClass('SupplyMin')] p2: maxlimit=0.3 minlimit=0.2 preferedwidth=0.254
Width Power_20mil [InNetClass('SupplyMax')] p3: maxlimit=0.31 minlimit=0.3 preferedwidth=0.305
Width [InNetClass('All Nets')] p4: maxlimit=0.155 minlimit=0.1 preferedwidth=0.15
19 further rules are at their usual default settings.

## Classes and differential pairs
net class Magnetorquer: BSTNFIL1 BSTNFIL2 BSTNFIL3 BSTPFIL1 BSTPFIL2 BSTPFIL3 LNFIL1 LNFIL2 LNFIL3 LPFIL1 LPFIL2 LPFIL3 MGTQ-NFIL1 MGTQ-NFIL2 MGTQ-NFIL3 MGTQ-PFIL1 MGTQ-PFIL2 MGTQ-PFIL3 NetC42A_2 NetC42B_2 NetC42C_2 NetC43A_2 NetC43B_2 NetC43C_2
channel class CurrentSensing: CAN-CurrSense IMU-CurrSense MGN-CurrSense MRAM-CurrSense
component class SEN: B4 B5 C30 C31 C32 C33 R47 R48 U3
component class MRAM-CurrSense: B6B B7B C44B C45B C46B Q1B R57B R58B R59B R60B U5B
component class MGN-CurrSense: B6D B7D C44D C45D C46D Q1D R57D R58D R59D R60D U5D
component class MEM: B9 C50 R73 R74 R75
component class IMU-CurrSense: B6C B7C C44C C45C C46C Q1C R57C R58C R59C R60C U5C
component class CON: H1 H2 J2 J3 J4 J5 J6 Q2 Q3 Q4 Q5 R65 R66 R67 R68 R69 R70 R71 R72 R76 R77 R78 R79 R80 R81 R82 R83 R84 R85 R86 R87
component class CAN-CurrSense: B6A B7A C44A C45A C46A Q1A R57A R58A R59A R60A U5A
component class CAN: B8 C47 C48 C49 R61 R62 R63 R64
component class C5V: B3 C27 C28 C29 D1 LED4 LED5 R36 R37 R38 R39 R40 R41 R42 R43 R44 R45 R46
net class SupplyMax: 5V-ADCS 5V-MGTQ NetC22_1 SW-3V3
channel class Filters: FIL1 FIL2 FIL3
net class SupplyMin: 3V3-CAN 3V3-IMU 3V3-MGN 3V3-MRAM 3V3-XM 3V3-YM 3V3-YP 3V3-ZP 5V CAN_VSEN EN-SWITCH-3V3 EN-SWITCH-5V FB-3V3 GND IMU_VSEN MGN_VSEN MRAM-VSEN NetB1_3 NetB1_17 NetB1_18 NetB3_3 NetB3_17 NetB3_18 OVP-3V3 OVP-5V PGND VConv VDD VSwitch
component class C3V3: 2 B1 B2 C13 C14 C15 C16 C17 C18 C19 C20 C21 C22 C23 C24 C25 C26 L1 LED2 LED3 R17 R18 R19 R20 R21 R22 R23 R24 R25 R26 R27 R28 R29 R30 R31 R32 R33 R34 R35 U2
component class FIL3: C32_U_Filters3 C33C C34C C35C C36C C37C C38C C39C C40C C41C C42C C43C J1C L2C L3C R49C R50C R51C R52C R53C R54C R55C R56C U4C
component class FIL2: C32_U_Filters2 C33B C34B C35B C36B C37B C38B C39B C40B C41B C42B C43B J1B L2B L3B R49B R50B R51B R52B R53B R54B R55B R56B U4B
component class FIL1: C32_U_Filters1 C33A C34A C35A C36A C37A C38A C39A C40A C41A C42A C43A J1A L2A L3A R49A R50A R51A R52A R53A R54A R55A R56A U4A
component class "Complete circuit": C1 C2 C3 C4 C5 C6 C7 C8 C9 C10 C11 C12 LED1 R1 R2 R3 R4 R5 R6 R9 R11 R12 R13 R14 R15 U1 X1 X2
differential pair CAN: +CAN_P -CAN_N

## Components (designator, comment, footprint, x,y, rotation, side; value= is the part's Value field where it differs from the comment)
B1 "TPS25940AQRVCRQ1" QFN50P300X400X80-21N 39.4,68.875 r0 top
B2 "TPS7A5201QRGRRQ1" QFN50P350X350X100-21N-D 8.3,68.9 r270 top
B3 "TPS25940AQRVCRQ1" QFN50P300X400X80-21N 47.425,69 r180 bottom
B4 "RM3100_W" RM3100_W 68.88,47.58 r270 top locked
B5 "TC1047AVNBTR" SOT96P237X112-3N 31.26,39.93 r180 top
B6A "INA180B2QDBVRQ1" SOT95P280X145-5N 63.625,38.7 r270 top (schematic designator B6)
B6B "INA180B2QDBVRQ1" SOT95P280X145-5N 25.2,52.025 r0 top (schematic designator B6)
B6C "INA180B2QDBVRQ1" SOT95P280X145-5N 45.575,23.925 r180 top (schematic designator B6)
B6D "INA180B2QDBVRQ1" SOT95P280X145-5N 73.55,57.75 r180 top (schematic designator B6)
B7A "74AUP1G08GW-Q100H" SOT65P212X110-5N 58.925,42.25 r90 bottom (schematic designator B7)
B7B "74AUP1G08GW-Q100H" SOT65P212X110-5N 15.425,48.35 r90 bottom (schematic designator B7)
B7C "74AUP1G08GW-Q100H" SOT65P212X110-5N 44.9,27.625 r0 bottom (schematic designator B7)
B7D "74AUP1G08GW-Q100H" SOT65P212X110-5N 74.875,52.3 r270 bottom (schematic designator B7)
B8 "TCAN337GD" SOIC127P600X175-8N 57.25,40.4 r90 top
B9 "MR25H40VDF" SON127P600X500X90-9N-D 20.35,47.05 r0 top
C1 "C1206C104K3GACAUTO" CAPC3216X180N 26.1,41.375 r270 top
C2 "C1206C104J4GACAUTO" CAPC340180_180N_KEM 46.725,51.725 r270 bottom
C3 "C1206C104J4GACAUTO" CAPC340180_180N_KEM 51.15,46.15 r270 bottom
C4 "C1206C104J4GACAUTO" CAPC340180_180N_KEM 45.225,42.672 r270 bottom
C5 "C1206C104J4GACAUTO" CAPC340180_180N_KEM 41.825,42.675 r270 bottom
C6 "C1206C104J4GACAUTO" CAPC340180_180N_KEM 38.85,42.65 r270 bottom
C7 "C1206C104J4GACAUTO" CAPC340180_180N_KEM 33.43,47.55 r270 bottom
C8 "C1206C104J4GACAUTO" CAPC340180_180N_KEM 40.3,51.75 r90 bottom
C9 "C0805X106K8RACAUTO7210" CAPC2012X145N 38.175,52.375 r90 bottom
C10 "C1206C104J4GACAUTO" CAPC340180_180N_KEM 43.875,51.772 r90 bottom
C11 "C0603X103F3GACAUTO" CAPC17795_95N_KEM 50.475,35.325 r270 top
C12 "C0603X103F3GACAUTO" CAPC17795_95N_KEM 57.05,52.45 r270 top
C13 "C1206C104K3GACAUTO" CAPC3216X180N 41.425,64.025 r270 top
C14 "GCM1885C1H272FA16J" GCM188 39.4,73.15 r90 top
C15 "C0805X103F5GACAUTO" C0805 12.45,73.5 r90 top
C16 "C0805X106J8RACAUTO" C0805 11.775,68.15 r90 top
C17 "GCM31CR71A226KE02L" CAPC3116X180N 14.775,73.45 r270 top
C18 "C0603X103F3GACAUTO" CAPC17795_95N_KEM 8.275,64.8 r90 top
C19 "C0805X225J4RECAUTO" C0805 20.825,72.6 r90 top
C20 "C1210X224J3GACAUTO" C1210_FT 30.85,73.05 r90 top
C21 "C1210X224J3GACAUTO" C1210_FT 18.175,73.075 r90 top
C22 "C1206C104K3GACAUTO" CAPC3216X180N 20.987,68.138 r90 top
C23 "C0805X225J4RECAUTO" C0805 28.175,72.3 r90 top
C24 "06035A220F4T2A" CAPC1608X90N 27.375,65.3 r270 top
C25 "GRT32ER60J107ME13L" GRT32ER60J107ME13L 18.616,63.906 r90 top
C26 "C0603X105J4RACAUTO" CAPC18095_95N_KEM 23.925,65.375 r90 top
C27 "C1206C104K3GACAUTO" CAPC3216X180N 45.4,64.05 r270 bottom
C28 "C0603X105J4RACAUTO" CAPC18095_95N_KEM 59.35,76.95 r270 bottom
C29 "GCM1885C1H272FA16J" GCM188 47.275,73.625 r90 bottom
C30 "C0805X106K8RACAUTO7210" CAPC2012X145N 53.7,27.875 r270 top
C31 "C0603X104J4RACTU" CAPC1608X87X45LL20T05 51.6,27.675 r90 top value=100nF
C32 "C0603X104J4RACTU" CAPC1608X87X45LL20T05 49.65,27.7 r90 top value=100nF
C33 "C0603X104J4RACTU" CAPC1608X87X45LL20T05 34.125,38.375 r270 top value=100nF
C33A "C0603X105K4RACAUTO7411" C0603 15.975,34.1 r90 top (schematic designator C33)
C33B "C0603X105K4RACAUTO7411" C0603 31.5,17.1 r90 top (schematic designator C33)
C33C "C0603X105K4RACAUTO7411" C0603 65.688,65.6 r270 top (schematic designator C33)
C34A "C0603X105K4RACAUTO7411" C0603 15.975,26.6 r270 top (schematic designator C34)
C34B "C0603X105K4RACAUTO7411" C0603 36,17.225 r90 top (schematic designator C34)
C34C "C0603X105K4RACAUTO7411" C0603 65.725,73.25 r90 top (schematic designator C34)
C35A "GCM31M5C1H563GA16L" GCM31C5C2E183FX03L 24.3,29.55 r270 bottom (schematic designator C35)
C35B "GCM31M5C1H563GA16L" GCM31C5C2E183FX03L 29.8,27.15 r90 top (schematic designator C35)
C35C "GCM31M5C1H563GA16L" GCM31C5C2E183FX03L 59.775,65.751 r270 bottom (schematic designator C35)
C36A "C0603X105K4RACAUTO7411" C0603 21.275,28.25 r270 top (schematic designator C36)
C36B "C0603X105K4RACAUTO7411" C0603 35.925,24.85 r90 bottom (schematic designator C36)
C36C "C0603X105K4RACAUTO7411" C0603 60.525,70.776 r90 bottom (schematic designator C36)
C37A "AC0603BRNPO9BN1R0" CAPC1608X90 12.45,34.1 r90 top value=1pF (schematic designator C37)
C37B "AC0603BRNPO9BN1R0" CAPC1608X90 28.1,17.075 r90 top value=1pF (schematic designator C37)
C37C "AC0603BRNPO9BN1R0" CAPC1608X90 69.188,65.6 r270 top value=1pF (schematic designator C37)
C38A "AC0603BRNPO9BN1R0" CAPC1608X90 12.225,26.575 r270 top value=1pF (schematic designator C38)
C38B "AC0603BRNPO9BN1R0" CAPC1608X90 39.525,17.125 r90 top value=1pF (schematic designator C38)
C38C "AC0603BRNPO9BN1R0" CAPC1608X90 69.242,73.534 r90 top value=1pF (schematic designator C38)
C39A "GCM31CR71A226KE02L" CAPC3116X180N 18.85,34.65 r270 top (schematic designator C39)
C39B "GCM31CR71A226KE02L" CAPC3116X180N 29.897,20.578 r90 top (schematic designator C39)
C39C "GCM31CR71A226KE02L" CAPC3116X180N 63.5,64 r90 top (schematic designator C39)
C40A "GCM31CR71A226KE02L" CAPC3116X180N 18.9,25.65 r90 top (schematic designator C40)
C40B "GCM31CR71A226KE02L" CAPC3116X180N 37.575,20.75 r90 top (schematic designator C40)
C40C "GCM31CR71A226KE02L" CAPC3116X180N 63.275,74.3 r270 top (schematic designator C40)
C41A "06035C431JAT2A" CAPC1608X90N 21.45,30.4 r270 bottom (schematic designator C41)
C41B "06035C431JAT2A" CAPC1608X90N 31.45,26.225 r90 top (schematic designator C41)
C41C "06035C431JAT2A" CAPC1608X90N 56.95,66.701 r270 bottom (schematic designator C41)
C42A "0603ZC103M4T2A" CAPC1608X90N 10.925,33.8 r90 top (schematic designator C42)
C42B "0603ZC103M4T2A" CAPC1608X90N 26.7,17.025 r90 top (schematic designator C42)
C42C "0603ZC103M4T2A" CAPC1608X90N 70.588,65.825 r270 top (schematic designator C42)
C43A "0603ZC103M4T2A" CAPC1608X90N 10.8,26.525 r270 top (schematic designator C43)
C43B "0603ZC103M4T2A" CAPC1608X90N 40.8,17.175 r90 top (schematic designator C43)
C43C "0603ZC103M4T2A" CAPC1608X90N 70.59,73.15 r90 top (schematic designator C43)
C44A "C0603X104J4RACTU" CAPC1608X87X45LL20T05 64.225,35.175 r270 top value=100nF (schematic designator C44)
C44B "C0603X104J4RACTU" CAPC1608X87X45LL20T05 28.175,52.175 r270 top value=100nF (schematic designator C44)
C44C "C0603X104J4RACTU" CAPC1608X87X45LL20T05 42.625,23.75 r90 top value=100nF (schematic designator C44)
C44D "C0603X104J4RACTU" CAPC1608X87X45LL20T05 70.75,57.55 r90 top value=100nF (schematic designator C44)
C45A "C0603X104J4RACTU" CAPC1608X87X45LL20T05 58.1,37.725 r90 bottom value=100nF (schematic designator C45)
C45B "C0603X104J4RACTU" CAPC1608X87X45LL20T05 22.55,46.475 r270 bottom value=100nF (schematic designator C45)
C45C "C0603X104J4RACTU" CAPC1608X87X45LL20T05 48.325,20.95 r270 bottom value=100nF (schematic designator C45)
C45D "C0603X104J4RACTU" CAPC1608X87X45LL20T05 77.15,57.15 r270 bottom value=100nF (schematic designator C45)
C46A "C0603X103F3GACAUTO" CAPC17795_95N_KEM 55.925,45.975 r270 bottom (schematic designator C46)
C46B "C0603X103F3GACAUTO" CAPC17795_95N_KEM 11.125,52.1 r270 bottom (schematic designator C46)
C46C "C0603X103F3GACAUTO" CAPC17795_95N_KEM 51,27.425 r270 bottom (schematic designator C46)
C46D "C0603X103F3GACAUTO" CAPC17795_95N_KEM 72.975,48.225 r90 bottom (schematic designator C46)
C47 "C0603C472F3GECAUTO" CAPC17595_87N_KEM 57.05,49.25 r90 top
C48 "C0603X105J4RACAUTO" CAPC18095_95N_KEM 58.075,34.7 r90 top
C49 "C0603X104J4RACTU" CAPC1608X87X45LL20T05 56.25,35.15 r270 top value=100nF
C50 "C1206C104J4GACAUTO" CAPC340180_180N_KEM 19.55,52.25 r270 top
D1 "VGSOT04-HG3-08" SOT95P242X112-3N 56.65,76.575 r270 bottom
H1 "ESQ-126-12-G-D" SAMTEC_ESQ-126-12-G-D 10.873,85.75 r180 top
H2 "ESQ-126-12-G-D" SAMTEC_ESQ-126-12-G-D 10.873,90.83 r180 top
J1A "532610271" CONN_532610001-SD_02_MOL 6.046,30.491 r90 top (schematic designator J1)
J1B "532610271" CONN_532610001-SD_02_MOL 33.775,10.875 r180 top locked (schematic designator J1)
J1C "532610271" CONN_532610001-SD_02_MOL 76.9,69.55 r270 top (schematic designator J1)
J2 "53261-0471" 53261-0471 59.875,12.875 r0 top
J3 "53261-0471" 53261-0471 7.925,47.5 r270 top
J4 "53261-0471" 53261-0471 75.6,13.7 r90 top
J5 "53261-0471" 53261-0471 75.775,28.55 r90 top
J6 "532614008" CONN_532610000-SD_08_MOL 12.525,10.9 r180 top
L1 "WE-XHMI_4020" WE-XHMI_4020 24.424,76.577 r180 top value=820nH
L2A "LQM2MPZ4R7MG0L" LQM2MPN1R0NG0L 14.175,34.1 r270 top (schematic designator L2)
L2B "LQM2MPZ4R7MG0L" LQM2MPN1R0NG0L 29.825,17.1 r270 top (schematic designator L2)
L2C "LQM2MPZ4R7MG0L" LQM2MPN1R0NG0L 67.388,65.575 r90 top (schematic designator L2)
L3A "LQM2MPZ4R7MG0L" LQM2MPN1R0NG0L 14.025,26.6 r90 top (schematic designator L3)
L3B "LQM2MPZ4R7MG0L" LQM2MPN1R0NG0L 37.725,17.125 r270 top (schematic designator L3)
L3C "LQM2MPZ4R7MG0L" LQM2MPN1R0NG0L 67.475,73.175 r270 top (schematic designator L3)
LED1 "TLMG1100-GS15" LED_0603_VIS 29.92,43.91 r270 top
LED2 "TLMG1100-GS15" LED_0603_VIS 67.375,36.5 r270 top
LED3 "TLMG1100-GS15" LED_0603_VIS 49.93,76.62 r270 top
LED4 "TLMG1100-GS15" LED_0603_VIS 70.875,36.475 r270 top
LED5 "TLMG1100-GS15" LED_0603_VIS 51.7,76.68 r270 top
Q1A "SSM6L820R,LXHF" TSOP6F_TOS 63.475,46.1 r90 bottom (schematic designator Q1)
Q1B "SSM6L820R,LXHF" TSOP6F_TOS 19.565,52.4 r0 bottom (schematic designator Q1)
Q1C "SSM6L820R,LXHF" TSOP6F_TOS 51.85,23.875 r0 bottom (schematic designator Q1)
Q1D "SSM6L820R,LXHF" TSOP6F_TOS 74.9,42.175 r270 bottom (schematic designator Q1)
Q2 "SSM6L820R,LXHF" TSOP6F_TOS 49.225,18.775 r180 top
Q3 "SSM6L820R,LXHF" TSOP6F_TOS 13.63,53.955 r0 top
Q4 "SSM6L820R,LXHF" TSOP6F_TOS 63.577,22.708 r180 top
Q5 "SSM6L820R,LXHF" TSOP6F_TOS 62.7,27.55 r180 top
R1 "ERA3ARB103V" RES_ERA3ARB103V 28.2,42.025 r270 top value=10k
R2 "CRCW06031K00FKEA" RES_CRCW_0603 28.22,44.88 r90 top
R3 "MCT0603MD7502BP100" RES_MCT_0603_VIS#1 31.725,43.975 r90 top
R4 "ERA3ARB103V" RES_ERA3ARB103V 37.575,46.5 r270 bottom value=10k
R5 "ERA3ARB103V" RES_ERA3ARB103V 36.2,38.3 r90 bottom value=10k
R6 "ERA3ARB103V" RES_ERA3ARB103V 38.075,38.3 r90 bottom value=10k
R9 "ERA3ARB103V" RES_ERA3ARB103V 48.975,51.775 r270 bottom value=10k
R11 "ERA3ARB103V" RES_ERA3ARB103V 43.7,57 r270 bottom value=10k
R12 "ERA3ARB103V" RES_ERA3ARB103V 41.975,57.025 r270 bottom value=10k
R13 "ERA3ARB103V" RES_ERA3ARB103V 39.9,57.025 r270 bottom value=10k
R14 "ERA3ARB103V" RES_ERA3ARB103V 37.95,57 r270 bottom value=10k
R15 "ERA3ARB103V" RES_ERA3ARB103V 36.225,57.025 r270 bottom value=10k
R17 "560112116148" WRIS-RSKS_0603_REFLOW 43.925,66.95 r90 top value=110k
R18 "560112116148" WRIS-RSKS_0603_REFLOW 36.325,68.1 r90 top value=110k
R19 "MCT0603MD7502BP100" RES_MCT_0603_VIS#2 69.3,36.7 r90 top
R20 "RQ73C1J3K4BTD" RESC1508X60N 42.275,69.45 r270 top value=3.4k
R21 "ERJ-PB3B3572V" RES_ERJ-PB3B3572V 34.75,67.825 r90 top value=35.7k
R22 "ERA3ARB103V" RES_ERA3ARB103V 35.875,73.125 r270 top value=10k
R23 "MCT0603MD7502BP100" RES_MCT_0603_VIS#1 47.95,76.675 r90 top
R24 "RNCP0603FTD24K9" RESC1508X50N 43.925,69.825 r270 top value=24.9k
R25 "RNCP0603FTD37K4" RESC1508X50N 41.125,73.15 r270 top value=37.4k
R26 "RMCF0603FT16K2" RESC1508X55N 37.55,73.15 r270 top value=16.2k
R27 "ERA3ARB103V" RES_ERA3ARB103V 34.225,71.55 r270 top value=10k
R28 "TNPW080511K8BEEN" RES_TNPW0805_VIS 9.85,73.225 r90 top
R29 "RN73R1JTTD3302F10" RESC1608X55N#1 5.431,72.371 r90 top value=33k
R30 "TNPW08053K74DEEA" RESC2012X55N 7.675,73.2 r270 top value=3.74k
R31 "TNPU0603100KAZEN00" RESC1608X55N#1 25.7,65.475 r270 top value=100k
R32 "CRCW06031K00FKEA" RES_CRCW_0603 26.3,62.3 r90 top
R33 "CRCW06035K76FKEA" RC0603N_VIS 27.9,68.425 r270 top
R34 "ERA3ARB103V" RES_ERA3ARB103V 11.831,64.923 r270 top value=10k
R35 "ERJPA3F3832V" RES_ERJPA3F3832V 29.225,65.325 r90 top value=38.3k
R36 "MCT0603MD7502BP100" RES_MCT_0603_VIS#2 72.375,36.7 r90 top
R37 "MCT0603MD7502BP100" RES_MCT_0603_VIS#2 53.59,76.793 r90 top
R38 "560112116148" WRIS-RSKS_0603_REFLOW 43.8,68 r90 bottom value=110k
R39 "560112116148" WRIS-RSKS_0603_REFLOW 50.302,68.409 r90 bottom value=110k
R40 "RQ73C1J3K4BTD" RESC1508X60N 42,69.725 r270 bottom value=3.4k
R41 "RNCP0603FTD35K7" RESC1508X50N 51.875,68.3 r90 bottom value=35.7k
R42 "ERA3ARB103V" RES_ERA3ARB103V 50.7,71.875 r270 bottom value=10k
R43 "RNCP0603FTD24K9" RESC1508X50N 43.825,70.9 r270 bottom value=24.9k
R44 "CRCW060330K1FKEAHP" RES_CRCW_0603_VIS 45.25,72.725 r90 bottom
R45 "CRCW060313K3FKEAHP" RESC1608X55N#1 49.125,73.025 r270 bottom value=13.3k
R46 "ERA3ARB103V" RES_ERA3ARB103V 52.275,71.225 r270 bottom value=10k
R47 "ERJ3BQF6R2V" RES_ERJ3BQF6R2V 48.675,23.875 r270 top value=6.2
R48 "ERJ3BQF1R0V" RES_ERJ3BQF1R0V 76.575,57.6 r270 top value=1
R49A "ERA3ARB103V" RES_ERA3ARB103V 14.8,31.05 r270 top value=10k (schematic designator R49)
R49B "ERA3ARB103V" RES_ERA3ARB103V 36.275,29.275 r90 top value=10k (schematic designator R49)
R49C "ERA3ARB103V" RES_ERA3ARB103V 58.975,64.151 r270 top value=10k (schematic designator R49)
R50A "ERJ-6ENF2260V" RC0805N_PAN 23.45,29.475 r90 top (schematic designator R50)
R50B "ERJ-6ENF2260V" RC0805N_PAN 33.95,24.825 r270 bottom (schematic designator R50)
R50C "ERJ-6ENF2260V" RC0805N_PAN 58.325,70.776 r270 bottom (schematic designator R50)
R51A "ERJ3EKF8062V" RES_ERJ3EKF8062V 21.275,31.65 r90 top value=80.6k (schematic designator R51)
R51B "ERJ3EKF8062V" RES_ERJ3EKF8062V 32.725,24.725 r90 top value=80.6k (schematic designator R51)
R51C "ERJ3EKF8062V" RES_ERJ3EKF8062V 59.325,67.926 r270 top value=80.6k (schematic designator R51)
R52A "CRCW0805100RFKEAHP" RESC2012X60N 10.715,37.623 r270 top value=100 (schematic designator R52)
R52B "CRCW0805100RFKEAHP" RESC2012X60N 25.1,17.15 r90 top value=100 (schematic designator R52)
R52C "CRCW0805100RFKEAHP" RESC2012X60N 72.047,65.825 r270 top value=100 (schematic designator R52)
R53A "ERA3ARB103V" RES_ERA3ARB103V 21.15,25.35 r90 top value=10k (schematic designator R53)
R53B "ERA3ARB103V" RES_ERA3ARB103V 40,23.375 r90 top value=10k (schematic designator R53)
R53C "ERA3ARB103V" RES_ERA3ARB103V 48.32,59.28 r90 top value=10k (schematic designator R53)
R54A "CRCW0805100RFKEAHP" RESC2012X60N 10.65,23.45 r90 top value=100 (schematic designator R54)
R54B "CRCW0805100RFKEAHP" RESC2012X60N 42.35,17.125 r90 top value=100 (schematic designator R54)
R54C "CRCW0805100RFKEAHP" RESC2012X60N 72.231,73.198 r90 top value=100 (schematic designator R54)
R55A "KDV06FR100ET" RES_KDV06_OHM 21.325,35.3 r270 top (schematic designator R55)
R55B "KDV06FR100ET" RES_KDV06_OHM 27.75,23.25 r270 top (schematic designator R55)
R55C "KDV06FR100ET" RES_KDV06_OHM 60.9,64.975 r90 top (schematic designator R55)
R56A "ERJPA3F3571V" RES_ERJPA3F3571V 24.275,25.2 r90 bottom value=3.57k (schematic designator R56)
R56B "ERJPA3F3571V" RES_ERJPA3F3571V 27.75,26.025 r90 top value=3.57k (schematic designator R56)
R56C "ERJPA3F3571V" RES_ERJPA3F3571V 56.95,63.876 r270 bottom value=3.57k (schematic designator R56)
R57A "ERA3ARB103V" RES_ERA3ARB103V 60.3,45.95 r270 bottom value=10k (schematic designator R57)
R57B "ERA3ARB103V" RES_ERA3ARB103V 15.7,51.875 r270 bottom value=10k (schematic designator R57)
R57C "ERA3ARB103V" RES_ERA3ARB103V 47.583,27.6 r90 bottom value=10k (schematic designator R57)
R57D "ERA3ARB103V" RES_ERA3ARB103V 75,48.225 r90 bottom value=10k (schematic designator R57)
R58A "RG1608N-104-W-T1" RESC1608X50N 56.077,41.998 r90 bottom value=100k (schematic designator R58)
R58B "RG1608N-104-W-T1" RESC1608X50N 13,48.3 r270 bottom value=100k (schematic designator R58)
R58C "RG1608N-104-W-T1" RESC1608X50N 41.7,28.4 r270 bottom value=100k (schematic designator R58)
R58D "RG1608N-104-W-T1" RESC1608X50N 72.573,51.851 r90 bottom value=100k (schematic designator R58)
R59A "CRCW060310K0DHEAP" RC0603N_VIS 64.375,49.847 r90 bottom (schematic designator R59)
R59B "CRCW060310K0DHEAP" RC0603N_VIS 22.8,52.425 r90 bottom (schematic designator R59)
R59C "CRCW060310K0DHEAP" RC0603N_VIS 54.925,23.875 r90 bottom (schematic designator R59)
R59D "CRCW060310K0DHEAP" RC0603N_VIS 71.925,41.525 r90 bottom (schematic designator R59)
R60A "TNPU060350K0HZEN00" RESC1608X55N#2 58.05,45.92 r270 bottom value=50k (schematic designator R60)
R60B "TNPU060350K0HZEN00" RESC1608X55N#2 13.45,52.025 r270 bottom value=50k (schematic designator R60)
R60C "TNPU060350K0HZEN00" RESC1608X55N#2 49.25,27.375 r270 bottom value=50k (schematic designator R60)
R60D "TNPU060350K0HZEN00" RESC1608X55N#2 77.225,48.175 r90 bottom value=50k (schematic designator R60)
R61 "SR731JTTDR124F" RESC1608X55N#1 62.875,42.675 r90 top value=0.124
R62 "P0603Y60R0BBT" RESC1508X63N 55.925,45.911 r90 top
R63 "P0603Y60R0BBT" RESC1508X63N 58.52,45.92 r90 top
R64 "ERA3ARB103V" RES_ERA3ARB103V 61,42.65 r90 top value=10k
R65 "RG1608N-472-D-T5" FP-RG1608-IPC_C 59.55,16.85 r270 top value=4.7k
R66 "RG1608N-472-D-T5" FP-RG1608-IPC_C 12.025,48.775 r270 top value=4.7k
R67 "RG1608N-472-D-T5" FP-RG1608-IPC_C 61.8,16.875 r270 top value=4.7k
R68 "RG1608N-472-D-T5" FP-RG1608-IPC_C 12.825,45.125 r270 top value=4.7k
R69 "RG1608N-472-D-T5" FP-RG1608-IPC_C 71.55,14.699 r90 top value=4.7k
R70 "RG1608N-472-D-T5" FP-RG1608-IPC_C 72.25,28.392 r90 top value=4.7k
R71 "RG1608N-472-D-T5" FP-RG1608-IPC_C 68.6,17.325 r90 top value=4.7k
R72 "RG1608N-472-D-T5" FP-RG1608-IPC_C 72.25,31 r270 top value=4.7k
R73 "ERJ3BQFR24V" RES_ERJ3BQFR24V 22.175,52.125 r90 top value=0.24
R74 "ERA3ARB103V" RES_ERA3ARB103V 15.775,49.75 r90 top value=10k
R75 "ERA3ARB103V" RES_ERA3ARB103V 24.85,48.625 r270 top value=10k
R76 "ERA3ARB103V" RES_ERA3ARB103V 54.5,17.5 r270 top value=10k
R77 "ERA3ARB103V" RES_ERA3ARB103V 8.45,54.6 r90 top value=10k
R78 "CRCW060310K0DHEAP" RC0603N_VIS 45.85,18.75 r90 top
R79 "TNPU060350K0HZEN00" RESC1608X55N#2 52.798,17.615 r90 top value=50k
R80 "CRCW060310K0DHEAP" RC0603N_VIS 16.572,53.882 r270 top
R81 "TNPU060350K0HZEN00" RESC1608X55N#2 10.057,54.698 r270 top value=50k
R82 "ERA3ARB103V" RES_ERA3ARB103V 68.75,21.55 r270 top value=10k
R83 "ERA3ARB103V" RES_ERA3ARB103V 67.925,26.2 r270 top value=10k
R84 "CRCW060310K0DHEAP" RC0603N_VIS 60.325,22.625 r90 top
R85 "CRCW060310K0DHEAP" RC0603N_VIS 59.6,27.55 r90 top
R86 "TNPU060350K0HZEN00" RESC1608X55N#2 67.15,21.425 r90 top value=50k
R87 "TNPU060350K0HZEN00" RESC1608X55N#2 66.273,26.162 r90 top value=50k
U1 "PIC32MZ2048EFM100-E_PT" QFP40P1400X1400X120-100N 42.275,47.3 r0 top locked
U2 "LM61430AASQRJRRQ1" RJR0014A-MFG 24.4,70.15 r90 top
U3 "ASM330LHHTR" LGA-14L_2P5X3X0P83_STM 45.78,27.824 r0 top locked
U4A "MP6519GQ-Z" QFN-3X3_MP6519_MNP 18,30.325 r270 top (schematic designator U4)
U4B "MP6519GQ-Z" QFN-3X3_MP6519_MNP 33.75,21.15 r0 top locked (schematic designator U4)
U4C "MP6519GQ-Z" QFN-3X3_MP6519_MNP 64.103,69.331 r90 top (schematic designator U4)
U5A "TLV3012BQDBVRQ1" SOT-23-6_DBV_TEX 60.775,38.075 r270 bottom (schematic designator U5)
U5B "TLV3012BQDBVRQ1" SOT-23-6_DBV_TEX 19.575,48.15 r0 bottom (schematic designator U5)
U5C "TLV3012BQDBVRQ1" SOT-23-6_DBV_TEX 45.663,23.75 r0 bottom (schematic designator U5)
U5D "TLV3012BQDBVRQ1" SOT-23-6_DBV_TEX 74.275,56.775 r90 bottom (schematic designator U5)
X1 "ATXAIG-H13-F-24.000MHZ-F25" OSC4_ATXAIG-H13_ABR 47.281,35.368 r180 top
X2 "ASAKDVAIG-32.768kHz-KC-T3" ASAKDVAIG32768KHZKCT3 54.2,52.025 r180 top

## Footprints (in the part's own frame and the unit in brackets; to place one, negate y for a bottom-side part, rotate by r counter-clockwise, add the part's x,y. Pads: shape width x height; smd on the part's side, far side on the other; paste and mask are expansions set on the pad)
53261-0471 [mm]
  rect 0.8x1.6 smd: 1(-1.875,0.8) 2(-0.625,0.8) 3(0.625,0.8) 4(1.875,0.8)
  rect 2.1x3 smd: 5(4.425,-2.1) 6(-4.425,-2.1)
  silkscreen extent -3.37,-4.2 3.37,2.17, body extent -5.07,-3.69 5.07,1.51, height 3.4
ASAKDVAIG32768KHZKCT3 [mm]
  rect 0.9x0.8 smd: 1(-0.7,-0.55) 2(0.7,-0.55) 3(0.7,0.55) 4(-0.7,0.55)
  silkscreen extent -0.75,-1.5 -0.65,-1.4
C0603 [mm]
  rect 0.95x1 smd: 1(-0.8,0) 2(0.8,0)
  silkscreen extent -1.7,-0.05 -1.6,0.05, body extent -0.87,-0.48 0.88,0.47, height 0.87
C0805 [mm]
  rect 1.15x1.45 smd: 1(-0.9,0) 2(0.9,0)
  silkscreen extent -1.95,-0.81 -1.86,-0.71, body extent -1.28,-0.79 1.02,0.76, height 0.98
C1210_FT [mm]
  rect 1.42x2.91 smd: 1(-1.49,0) 2(1.49,0)
  silkscreen extent -2.92,-0.13 -2.67,0.13, body extent -1.85,-1.4 1.85,1.5, height 1.1
CAPC1608X87X45LL20T05 [mm] "Chip Capacitor, 2-Leads, Body 1.60x0.80mm, IPC High Density"
  rect 0.85x0.9 smd: 1(-0.6,0) 2(0.6,0)
  body extent -0.9,-0.5 0.9,0.5, height 0.87
CAPC1608X90 [mm]
  rect 1.1x1 smd: 1(-0.85,0) 2(0.85,0)
  silkscreen extent 0,-0.51 0,0.55, body extent -0.8,-0.4 0.8,0.4, height 0.9
CAPC1608X90N [mm]
  rect 0.78x0.99 smd: 1(-0.7,0) 2(0.7,0)
CAPC2012X145N [mm]
  rect 1.14x1.57 smd: 1(-0.81,0) 2(0.81,0)
CAPC3116X180N [mm]
  rect 1.01x1.82 smd: 1(-1.32,0) 2(1.32,0)
  silkscreen extent 0,-0.7 0,0.7
CAPC3216X180N [mm]
  rect 1.02x1.82 smd: 1(-1.4,0) 2(1.4,0)
  silkscreen extent 0,-0.7 0,0.7
CAPC17595_87N_KEM [mm]
  rect 1.006x0.95 smd paste+0 mask+0: 1(-0.728,0) 2(0.728,0)
  body extent -0.87,-0.48 0.87,0.48, height 0.87
CAPC17795_95N_KEM [mm]
  rect 1.1x0.95 smd paste+0 mask+0: 1(-0.678,0) 2(0.678,0)
  body extent -0.88,-0.48 0.88,0.48, height 0.95
CAPC18095_95N_KEM [mm]
  rect 1.056x0.95 smd paste+0 mask+0: 1(-0.728,0) 2(0.728,0)
  body extent -0.9,-0.48 0.9,0.48, height 0.95
CAPC340180_180N_KEM [mm]
  rect 1.056x1.8 smd paste+0 mask+0: 1(-1.528,0) 2(1.528,0)
  silkscreen extent -2.79,-1.03 0.69,1.03, body extent -1.7,-0.9 1.7,0.9, height 1.8
CONN_532610000-SD_08_MOL [mil]
  rect 32x67 smd paste+0 mask+0: 1(172.24,-114.35) 2(123.03,-114.35) 3(73.82,-114.35) 4(24.61,-114.35) 5(-24.61,-114.35) 6(-73.82,-114.35) 7(-123.03,-114.35) 8(-172.24,-114.35)
  rect 87x122 smd paste+0 mask+0: 9(-272.64,-0.18) 10(272.64,-0.18)
  silkscreen extent -296,-129 371,88
CONN_532610001-SD_02_MOL [mil]
  rect 32x67 smd paste+0 mask+0: 1(24.61,-114.35) 2(-24.61,-114.35)
  rect 87x122 smd paste+0 mask+0: 3(-125,-0.18) 4(125,-0.18)
  silkscreen extent -148,-88 234,88
FP-RG1608-IPC_C [mm]
  rect 0.855x0.906 smd paste+0 mask+0: 1(-0.626,0) 2(0.626,0)
  silkscreen extent -1.05,-0.9 1.05,0.9, body extent -1.15,-0.6 1.15,0.6, height 0.25
GCM31C5C2E183FX03L [mm]
  rect 1.05x1.6 smd: 1(-1.475,0) 2(1.475,0)
  silkscreen extent -2.6,-0.7 0,0.7, body extent -1.6,-0.8 1.6,0.8, height 1.6
GCM188 [mm]
  rect 0.8x0.9 smd: 1(-0.7,0) 2(0.7,0)
  silkscreen extent -1.43,-0.05 -1.33,0.05, body extent -0.8,-0.4 0.8,0.4, height 0.9
GRT32ER60J107ME13L [mm]
  rect 1.1x2.05 smd: 1(-1.65,0) 2(1.65,0)
  silkscreen extent -2.7,-1.25 0.8,1.25
LED_0603_VIS [mil]
  rect 24x33 smd paste+0 mask+0: 1(-33.5,0) 2(33.5,0)
  silkscreen extent -10,-23 10,23
LGA-14L_2P5X3X0P83_STM [mm]
  rect 0.577x0.352 smd paste+0 mask+0.102: 1(-1.21,0.75) 2(-1.21,0.25) 3(-1.21,-0.25) 4(-1.21,-0.75) 8(1.21,-0.75) 9(1.21,-0.25) 10(1.21,0.25) 11(1.21,0.75)
  rect 0.352x0.577 smd paste+0 mask+0.102: 5(-0.5,-0.956) 6(0,-0.956) 7(0.5,-0.956) 12(0.5,0.956) 13(0,0.956) 14(-0.5,0.956)
  silkscreen extent -1.68,-1.52 2.03,1.58, body extent -1.55,-1.3 1.55,1.3, height 0.87
LQM2MPN1R0NG0L [mm]
  rect 0.8x1.8 smd: 1(-0.8,0) 2(0.8,0)
  silkscreen extent 0,-0.7 0,0.7, body extent -1,-0.8 1,0.8, height 0.9
OSC4_ATXAIG-H13_ABR [mm]
  rect 0.813x0.889 smd paste+0 mask+0: 1(-0.55,0.7) 2(-0.55,-0.7) 3(0.55,-0.7) 4(0.55,0.7)
  silkscreen extent -2.29,0.57 -2.04,0.83, body extent -0.85,-1.05 0.85,1.05, height 0.81
QFN50P300X400X80-21N [mm]
  rect 0.85x0.25 smd: 1(-1.45,1.25) 2(-1.45,0.75) 3(-1.45,0.25) 4(-1.45,-0.25) 5(-1.45,-0.75) 6(-1.45,-1.25) 11(1.45,-1.25) 12(1.45,-0.75) 13(1.45,-0.25) 14(1.45,0.25) 15(1.45,0.75) 16(1.45,1.25)
  rect 0.25x0.85 smd: 7(-0.75,-1.95) 8(-0.25,-1.95) 9(0.25,-1.95) 10(0.75,-1.95) 17(0.75,1.95) 18(0.25,1.95) 19(-0.25,1.95) 20(-0.75,1.95)
  rect 1.7x2.7 smd: 21(0,0)
  silkscreen extent -2,1.88 -1.75,2.12
QFN50P350X350X100-21N-D [mm]
  rect 0.9x0.3 smd: 1(-1.7,1) 2(-1.7,0.5) 3(-1.7,0) 4(-1.7,-0.5) 5(-1.7,-1) 11(1.7,-1) 12(1.7,-0.5) 13(1.7,0) 14(1.7,0.5) 15(1.7,1)
  rect 0.3x0.9 smd: 6(-1,-1.7) 7(-0.5,-1.7) 8(0,-1.7) 9(0.5,-1.7) 10(1,-1.7) 16(1,1.7) 17(0.5,1.7) 18(0,1.7) 19(-0.5,1.7) 20(-1,1.7)
  rect 2.15x2.15 smd: 21(0,0)
  silkscreen extent -2.27,1.63 -2.03,1.88
QFN-3X3_MP6519_MNP [mil]
  rect 43x8 smd paste+0 mask+0: 1(-49.29,23.62)
  rect 51x8 smd paste+0 mask+0: 2(-45.28,0) 3(-45.28,-23.62) 10(45.28,-23.62) 11(45.28,0) 12(45.28,23.62)
  rect 8x28 smd paste+0 mask+0: 4(-47.24,-57.09) 5(-23.62,-57.09) 6(-7.87,-57.09) 7(7.87,-57.09) 8(23.62,-57.09) 9(47.24,-57.09) 13(47.24,57.09) 14(31.5,57.09) 15(15.75,57.09) 16(0,57.09) 17(-15.75,57.09) 18(-31.5,57.09) 19(-47.24,57.09)
  silkscreen extent -66,-66 66,66
QFP40P1400X1400X120-100N [mm]
  rect 1.475x0.2 smd: 1(-6.738,4.8) 2(-6.738,4.4) 3(-6.738,4) 4(-6.738,3.6) 5(-6.738,3.2) 6(-6.738,2.8) 7(-6.738,2.4) 8(-6.738,2) 9(-6.738,1.6) 10(-6.738,1.2) 11(-6.738,0.8) 12(-6.738,0.4) 13(-6.738,0) 14(-6.738,-0.4) 15(-6.738,-0.8) 16(-6.738,-1.2) 17(-6.738,-1.6) 18(-6.738,-2) 19(-6.738,-2.4) 20(-6.738,-2.8) 21(-6.738,-3.2) 22(-6.738,-3.6) 23(-6.738,-4) 24(-6.738,-4.4) 25(-6.738,-4.8) 51(6.738,-4.8) 52(6.738,-4.4) 53(6.738,-4) 54(6.738,-3.6) 55(6.738,-3.2) 56(6.738,-2.8) 57(6.738,-2.4) 58(6.738,-2) 59(6.738,-1.6) 60(6.738,-1.2) 61(6.738,-0.8) 62(6.738,-0.4) 63(6.738,0) 64(6.738,0.4) 65(6.738,0.8) 66(6.738,1.2) 67(6.738,1.6) 68(6.738,2) 69(6.738,2.4) 70(6.738,2.8) 71(6.738,3.2) 72(6.738,3.6) 73(6.738,4) 74(6.738,4.4) 75(6.738,4.8)
  rect 0.2x1.475 smd: 26(-4.8,-6.738) 27(-4.4,-6.738) 28(-4,-6.738) 29(-3.6,-6.738) 30(-3.2,-6.738) 31(-2.8,-6.738) 32(-2.4,-6.738) 33(-2,-6.738) 34(-1.6,-6.738) 35(-1.2,-6.738) 36(-0.8,-6.738) 37(-0.4,-6.738) 38(0,-6.738) 39(0.4,-6.738) 40(0.8,-6.738) 41(1.2,-6.738) 42(1.6,-6.738) 43(2,-6.738) 44(2.4,-6.738) 45(2.8,-6.738) 46(3.2,-6.738) 47(3.6,-6.738) 48(4,-6.738) 49(4.4,-6.738) 50(4.8,-6.738) 76(4.8,6.738) 77(4.4,6.738) 78(4,6.738) 79(3.6,6.738) 80(3.2,6.738) 81(2.8,6.738) 82(2.4,6.738) 83(2,6.738) 84(1.6,6.738) 85(1.2,6.738) 86(0.8,6.738) 87(0.4,6.738) 88(0,6.738) 89(-0.4,6.738) 90(-0.8,6.738) 91(-1.2,6.738) 92(-1.6,6.738) 93(-2,6.738) 94(-2.4,6.738) 95(-2.8,6.738) 96(-3.2,6.738) 97(-3.6,6.738) 98(-4,6.738) 99(-4.4,6.738) 100(-4.8,6.738)
  silkscreen extent -7.37,-5.65 5.65,5.65
RC0603N_VIS [mm]
  rect 0.756x0.8 smd paste+0 mask+0: 1(-0.778,0) 2(0.778,0)
  body extent -0.8,-0.4 0.8,0.4, height 0.71
RC0805N_PAN [mm]
  rect 1.006x1.2 smd paste+0 mask+0: 1(-0.853,0) 2(0.853,0)
  body extent -1,-0.6 1,0.6, height 0.71
RES_CRCW_0603 [mil]
  rect 33.78x37 smd paste+0 mask+0: 1(-29.39,0) 2(29.39,0)
  silkscreen extent -61,-1 -59,1, body extent -33,-19 33,19, height 20
RES_CRCW_0603_VIS [mil]
  rect 30x37 smd paste+0 mask+0: 1(-27.5,0) 2(27.5,0)
  Top Layer keep-out region: 44.3,-3.91 44.3,-7.91 105.3,-7.91 105.3,-3.91
  Top Layer keep-out region: 44.3,-40.91 44.3,-44.91 105.3,-44.91 105.3,-40.91
  body extent -33,-19 33,19, height 20
RES_ERA3ARB103V [mm]
  rect 0.65x0.9 smd: 1(-0.725,0) 2(0.725,0)
  silkscreen extent -0.08,-0.4 0.08,0.4
RES_ERJ3BQF1R0V [mm]
  rect 0.65x0.9 smd: 1(-0.725,0) 2(0.725,0)
  silkscreen extent -0.08,-0.4 0.08,0.4, body extent -0.8,-0.4 0.8,0.4, height 0.45
RES_ERJ3BQF6R2V [mm]
  rect 0.65x0.9 smd paste+0 mask+0.102: 1(-0.725,0) 2(0.725,0)
  silkscreen extent -0.08,-0.4 0.08,0.4, body extent -0.8,-0.4 0.8,0.4, height 0.45
RES_ERJ3BQFR24V [mm]
  rect 0.65x0.9 smd paste+0 mask+0.102: 1(-0.725,0) 2(0.725,0)
  silkscreen extent -0.08,-0.4 0.08,0.4, body extent -0.8,-0.4 0.8,0.4, height 0.45
RES_ERJ3EKF8062V [mm]
  rect 0.65x0.9 smd: 1(-0.725,0) 2(0.725,0)
  silkscreen extent -0.08,-0.4 0.08,0.4, body extent -0.8,-0.4 0.8,0.4, height 0.45
RES_ERJ-PB3B3572V [mm]
  rect 0.65x0.9 smd paste+0 mask+0.102: 1(-0.725,0) 2(0.725,0)
  silkscreen extent -0.08,-0.4 0.08,0.4, body extent -0.8,-0.4 0.8,0.4, height 0.45
RES_ERJPA3F3571V [mm]
  rect 0.65x0.9 smd paste+0 mask+0.102: 1(-0.725,0) 2(0.725,0)
  silkscreen extent -0.08,-0.4 0.08,0.4, body extent -0.8,-0.4 0.8,0.4, height 0.45
RES_ERJPA3F3832V [mm]
  rect 0.65x0.9 smd paste+0 mask+0.102: 1(-0.725,0) 2(0.725,0)
  silkscreen extent -0.08,-0.4 0.08,0.4, body extent -0.8,-0.4 0.8,0.4, height 0.45
RES_KDV06_OHM [mil]
  rect 26x35 smd paste+0 mask+0: 1(-28.5,0) 2(28.5,0)
  silkscreen extent -3,-22 3,22, body extent -34,-17 34,17, height 22
RES_MCT_0603_VIS#1 [mil]
  rect 29x37 smd paste+0 mask+0: 1(-28,0) 2(28,0)
  body extent -31,-19 31,19, height 22
RES_MCT_0603_VIS#2 [mil]
  rect 29x37 smd paste+0 mask+0: 1(-28,0) 2(28,0)
  Top Layer keep-out region: 45.3,44.91 45.3,40.91 104.3,40.91 104.3,44.91
  Top Layer keep-out region: 45.3,7.91 45.3,3.91 104.3,3.91 104.3,7.91
  body extent -31,-19 31,19, height 22
RES_TNPW0805_VIS [mil]
  rect 37.78x55 smd paste+0 mask+0: 1(-36.39,0) 2(36.39,0)
  silkscreen extent -39,-53 5,32, body extent -41,-27 41,27, height 22
RESC1508X50N [mm]
  rect 0.97x0.93 smd paste+0 mask+0.102: 1(-0.68,0) 2(0.68,0)
  body extent -0.75,-0.4 0.75,0.4, height 0.5
RESC1508X55N [mm]
  rect 0.9x0.97 smd: 1(-0.76,0) 2(0.76,0)
RESC1508X60N [mm]
  rect 0.84x0.93 smd: 1(-0.77,0) 2(0.77,0)
RESC1508X63N [mm]
  rect 0.95x1 smd: 1(-0.75,0) 2(0.75,0)
RESC1608X50N [mm]
  rect 0.94x1.02 smd paste+0 mask+0.102: 1(-0.79,0) 2(0.79,0)
  body extent -0.8,-0.4 0.8,0.4, height 0.5
RESC1608X55N#1 [mm]
  rect 0.87x0.98 smd paste+0 mask+0.102: 1(-0.78,0) 2(0.78,0)
  body extent -0.8,-0.43 0.8,0.43, height 0.55
RESC1608X55N#2 [mm]
  rect 0.87x0.98 smd: 1(-0.78,0) 2(0.78,0)
  body extent -0.8,-0.43 0.8,0.43, height 0.55
RESC2012X55N [mm]
  rect 0.97x1.42 smd: 1(-0.93,0) 2(0.93,0)
  silkscreen extent -0.12,-0.7 0.12,0.7
RESC2012X60N [mm]
  rect 1x1.42 smd paste+0 mask+0.102: 1(-0.935,0) 2(0.935,0)
  silkscreen extent -0.12,-0.7 0.12,0.7, body extent -1,-0.63 1,0.63, height 0.6
RJR0014A-MFG [mm]
  round 0.394 smd paste-0.184 mask+0: 1(-1.72,1.18) 5(-1.719,-1.206)
  rect 0.7x0.25 smd paste+0 mask+0: 2(-1.85,0.525) 4(-1.85,-0.525)
  rect 0.7x0.3 smd paste+0 mask+0: 3(-1.85,0)
  rect 0.25x0.7 smd paste+0 mask+0: 6(-1.125,-1.6) 7(-0.625,-1.6) 13(-0.625,1.6) 14(-1.125,1.6)
  rect 0.4x1 smd paste+0 mask+0: 8(0.45,-1.45) 12(0.45,1.45)
  round 0.45 smd paste-0.212 mask+0: 9(1.65,-1.2) 11(1.65,1.2)
  rect 2.4x0.4 smd paste-1.187 mask+0: 10(1,0)
  Top Layer region: 1.45,1.95 1.45,1.95 1.75,1.95 1.8,1.9 1.8,1.47 1.92,1.35 2.15,1.35 2.2,1.3 2.2,1 2.15,0.95 1.45,0.95 1.4,1 1.4,1.9
  Top Layer region: 1.45,-1.95 1.45,-1.95 1.75,-1.95 1.8,-1.9 1.8,-1.47 1.92,-1.35 2.15,-1.35 2.2,-1.3 2.2,-1 2.15,-0.95 1.45,-0.95 1.4,-1 1.4,-1.9
  Top Layer region: -1.8,1.95 -1.8,1.95 -1.55,1.95 -1.5,1.9 -1.5,1 -1.55,0.95 -2.15,0.95 -2.2,1 -2.2,1.3 -2.15,1.35 -1.97,1.35 -1.85,1.47 -1.85,1.9
  Top Layer region: -1.8,-1.95 -1.55,-1.95 -1.5,-1.9 -1.5,-1 -1.55,-0.95 -2.15,-0.95 -2.2,-1 -2.2,-1.3 -2.15,-1.35 -1.97,-1.35 -1.85,-1.47 -1.85,-1.9
  silkscreen extent -3.02,-2.15 2.4,2.15
RM3100_W [mm] "Magnetometer from Wortem. Courtyard design following IPC 7352 level B."
  rect 1.35x1.35 hole 0.86 paste-2539.97 mask+0.125: 1(-7,0)
  round 1.35 hole 0.86 paste-2539.97 mask+0.125: 2(-5,0) 3(-3,0) 4(-1,0) 5(1,0) 6(3,0) 7(5,0) 8(7,0)
  silkscreen extent -8.13,-2.41 8.13,13.21
SAMTEC_ESQ-126-12-G-D [mm]
  rect 1.37x1.37 hole 1.02: 01(0,0)
  round 1.37 hole 1.02: 02(0,2.54) 03(-2.54,0) 04(-2.54,2.54) 05(-5.08,0) 06(-5.08,2.54) 07(-7.62,0) 08(-7.62,2.54) 09(-10.16,0) 10(-10.16,2.54) 11(-12.7,0) 12(-12.7,2.54) 13(-15.24,0) 14(-15.24,2.54) 15(-17.78,0) 16(-17.78,2.54) 17(-20.32,0) 18(-20.32,2.54) 19(-22.86,0) 20(-22.86,2.54) 21(-25.4,0) 22(-25.4,2.54) 23(-27.94,0) 24(-27.94,2.54) 25(-30.48,0) 26(-30.48,2.54) 27(-33.02,0) 28(-33.02,2.54) 29(-35.56,0) 30(-35.56,2.54) 31(-38.1,0) 32(-38.1,2.54) 33(-40.64,0) 34(-40.64,2.54) 35(-43.18,0) 36(-43.18,2.54) 37(-45.72,0) 38(-45.72,2.54) 39(-48.26,0) 40(-48.26,2.54) 41(-50.8,0) 42(-50.8,2.54) 43(-53.34,0) 44(-53.34,2.54) 45(-55.88,0) 46(-55.88,2.54) 47(-58.42,0) 48(-58.42,2.54) 49(-60.96,0) 50(-60.96,2.54) 51(-63.5,0) 52(-63.5,2.54)
  silkscreen extent -65.03,-1.2 2.27,3.74
SOIC127P600X175-8N [mm]
  rect 1.528x0.65 smd: 1(-2.711,1.905) 2(-2.711,0.635) 3(-2.711,-0.635) 4(-2.711,-1.905) 5(2.711,-1.905) 6(2.711,-0.635) 7(2.711,0.635) 8(2.711,1.905)
  silkscreen extent -3.47,-2.45 1.6,2.58
SON127P600X500X90-9N-D [mm]
  rect 1.05x0.45 smd: 1(-2.85,1.905) 2(-2.85,0.635) 3(-2.85,-0.635) 4(-2.85,-1.905) 5(2.85,-1.905) 6(2.85,-0.635) 7(2.85,0.635) 8(2.85,1.905)
  rect 2.1x2.1 smd: 9(0,0)
  silkscreen extent -3.5,2.51 -3.25,2.75
SOT65P212X110-5N [mm]
  rect 1.05x0.4 smd: 1(-0.95,0.65) 2(-0.95,0) 3(-0.95,-0.65) 4(0.95,-0.65) 5(0.95,0.65)
  silkscreen extent -1.56,-1.02 0.08,1.4
SOT95P242X112-3N [mm]
  rect 1.1x0.6 smd: 1(-1.1,0.95) 2(-1.1,-0.95) 3(1.1,0)
  silkscreen extent -1.71,-1.48 0.2,1.77, body extent -1.21,-1.48 1.21,1.48, height 1.12
SOT95P280X145-5N [mm]
  rect 1.2x0.6 smd: 1(-1.25,0.95) 2(-1.25,0) 3(-1.25,-0.95) 4(1.25,-0.95) 5(1.25,0.95)
  silkscreen extent -1.83,-1.45 0.3,1.78
SOT96P237X112-3N [mm]
  rect 1.25x0.65 smd: 1(-1.05,0.96) 2(-1.05,-0.96) 3(1.05,0)
  silkscreen extent -1.68,-1.46 0.08,1.73
SOT-23-6_DBV_TEX [mm]
  rect 0.972x0.558 smd paste+0 mask+0: 1(-1.362,0.95) 2(-1.362,0) 3(-1.362,-0.95) 4(1.362,-0.95) 5(1.362,0) 6(1.362,0.95)
  silkscreen extent -1,-1.65 1,1.65, body extent -1.5,-1.52 1.5,1.52, height 1.45
TSOP6F_TOS [mil]
  rect 27x18 smd paste+0 mask+0: 1(-55.5,37.4) 2(-55.5,0) 3(-55.5,-37.4) 4(55.5,-37.4) 5(55.5,0) 6(55.5,37.4)
  silkscreen extent -112,-66 51,66, body extent -57,-61 57,61, height 35
WE-XHMI_4020 [mm]
  rect 3.8x1.2 smd: 1(0,1.225) 2(0,-1.225)
  silkscreen extent -3.09,-2.25 2.25,2.25
WRIS-RSKS_0603_REFLOW [mm] "Fixed Thick Film, body 1.60 x 0.80 mm"
  rect 0.6x0.9 smd: 1(-0.75,0) 2(0.75,0)
  body extent -0.8,-0.4 0.8,0.4, height 0.45